# Altium PCB PCB1.PcbDoc (part 1 of 2)
Units mm, origin at the board's own origin, x right, y up, seen from the top; angles counter-clockwise.
Board outline 126 x 133 mm, 6 copper layers (Top Layer, GND Layer, Signal Layer 1, Signal Layer 2, VCC Layer, Bottom Layer), stack 0.887 mm thick; 217 components, 126 nets, 563 pads, 129 vias.
Unrouted connection lines stored in the file: 18.
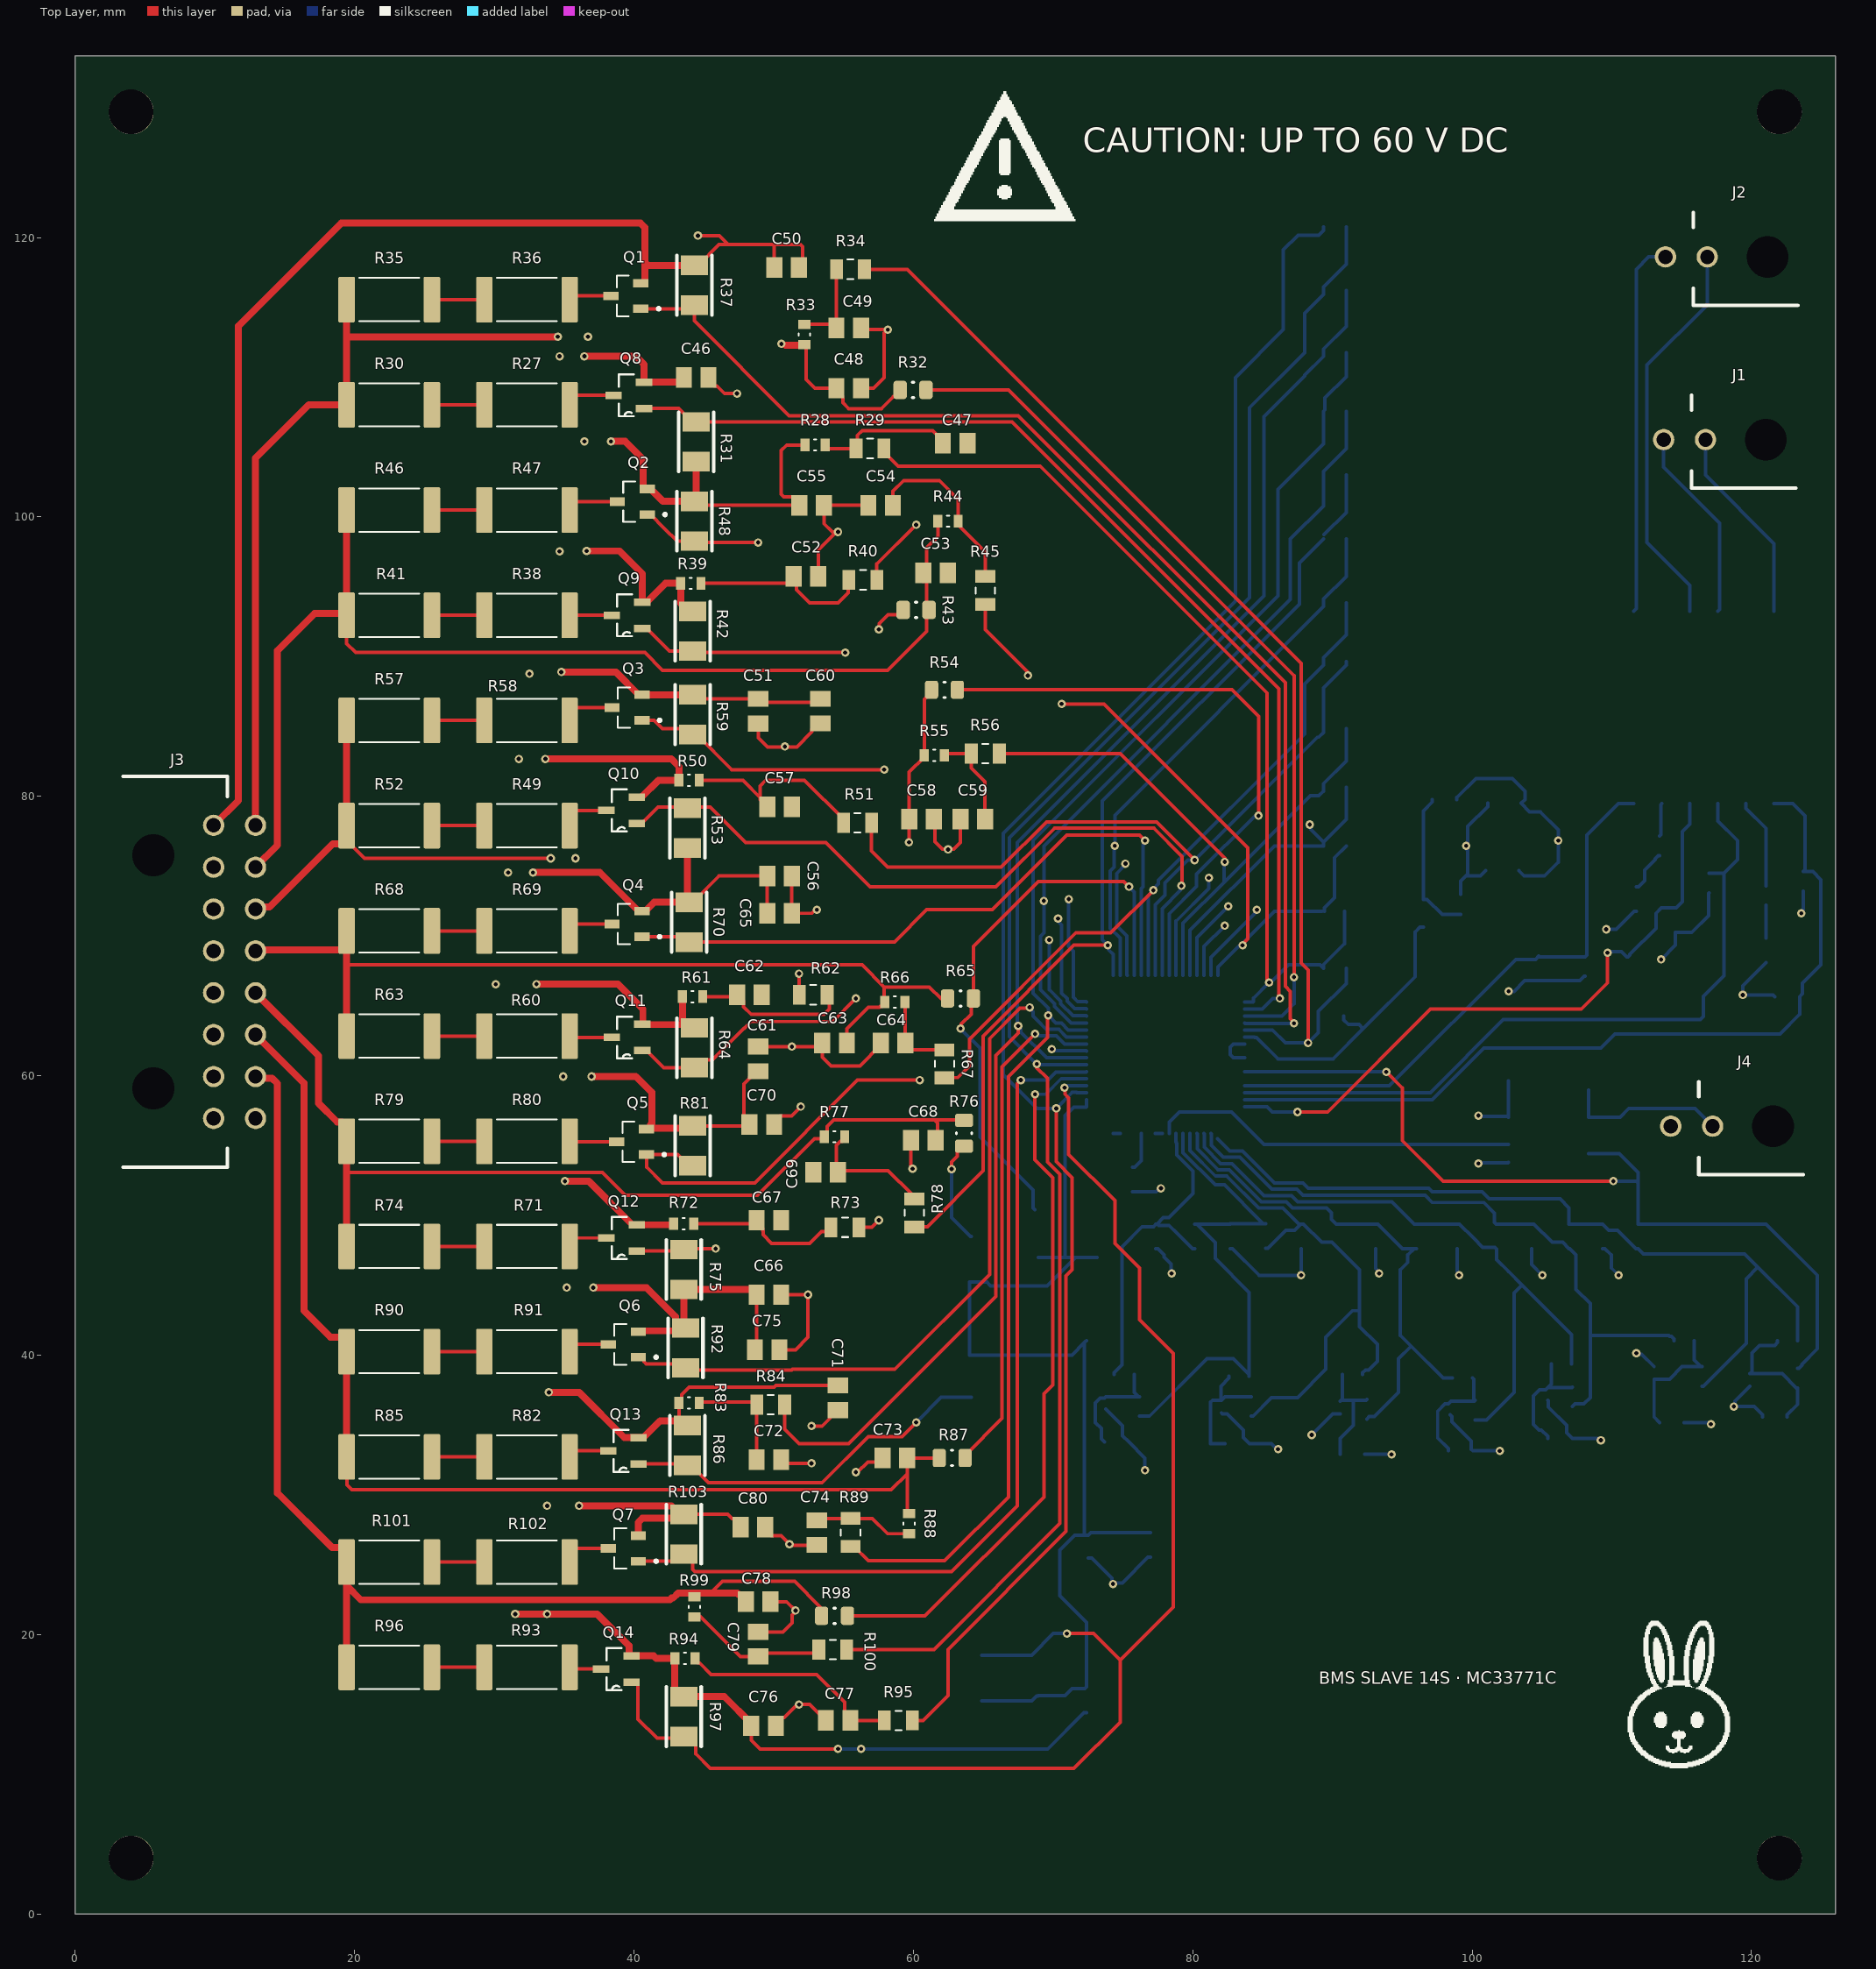
[diagram p0: Top Layer view]
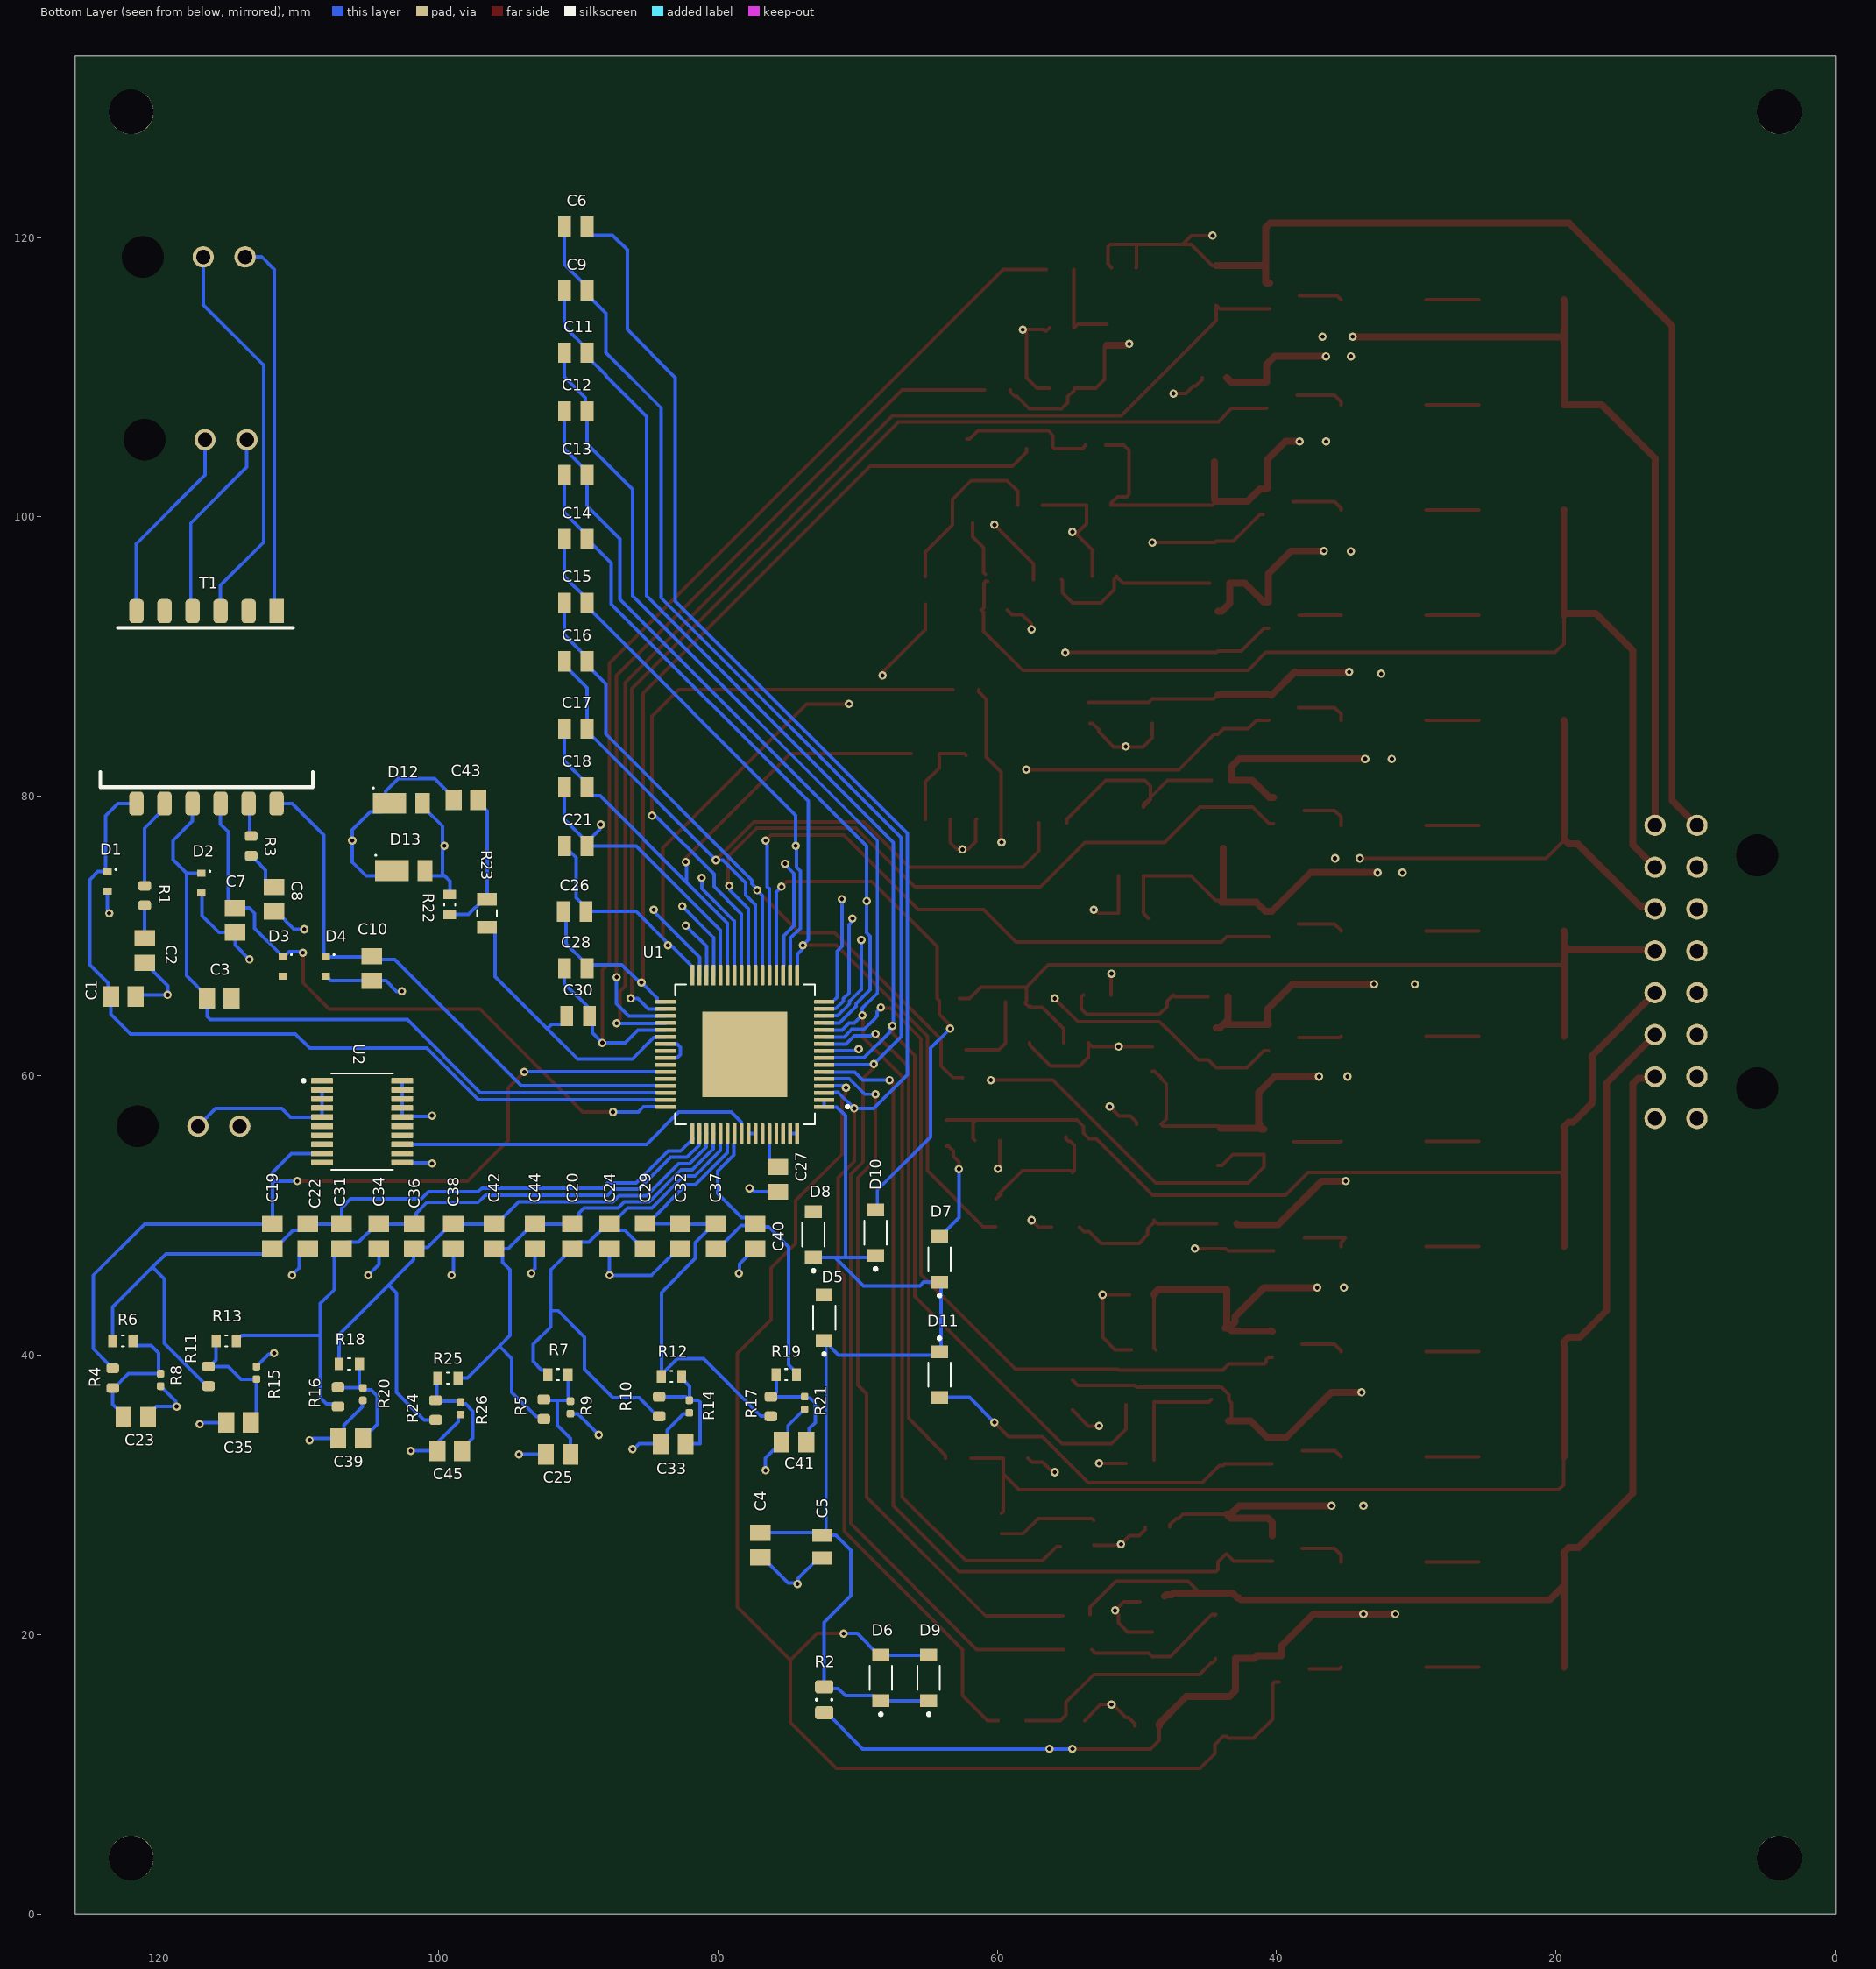
[diagram p1: Bottom Layer view, seen from below]
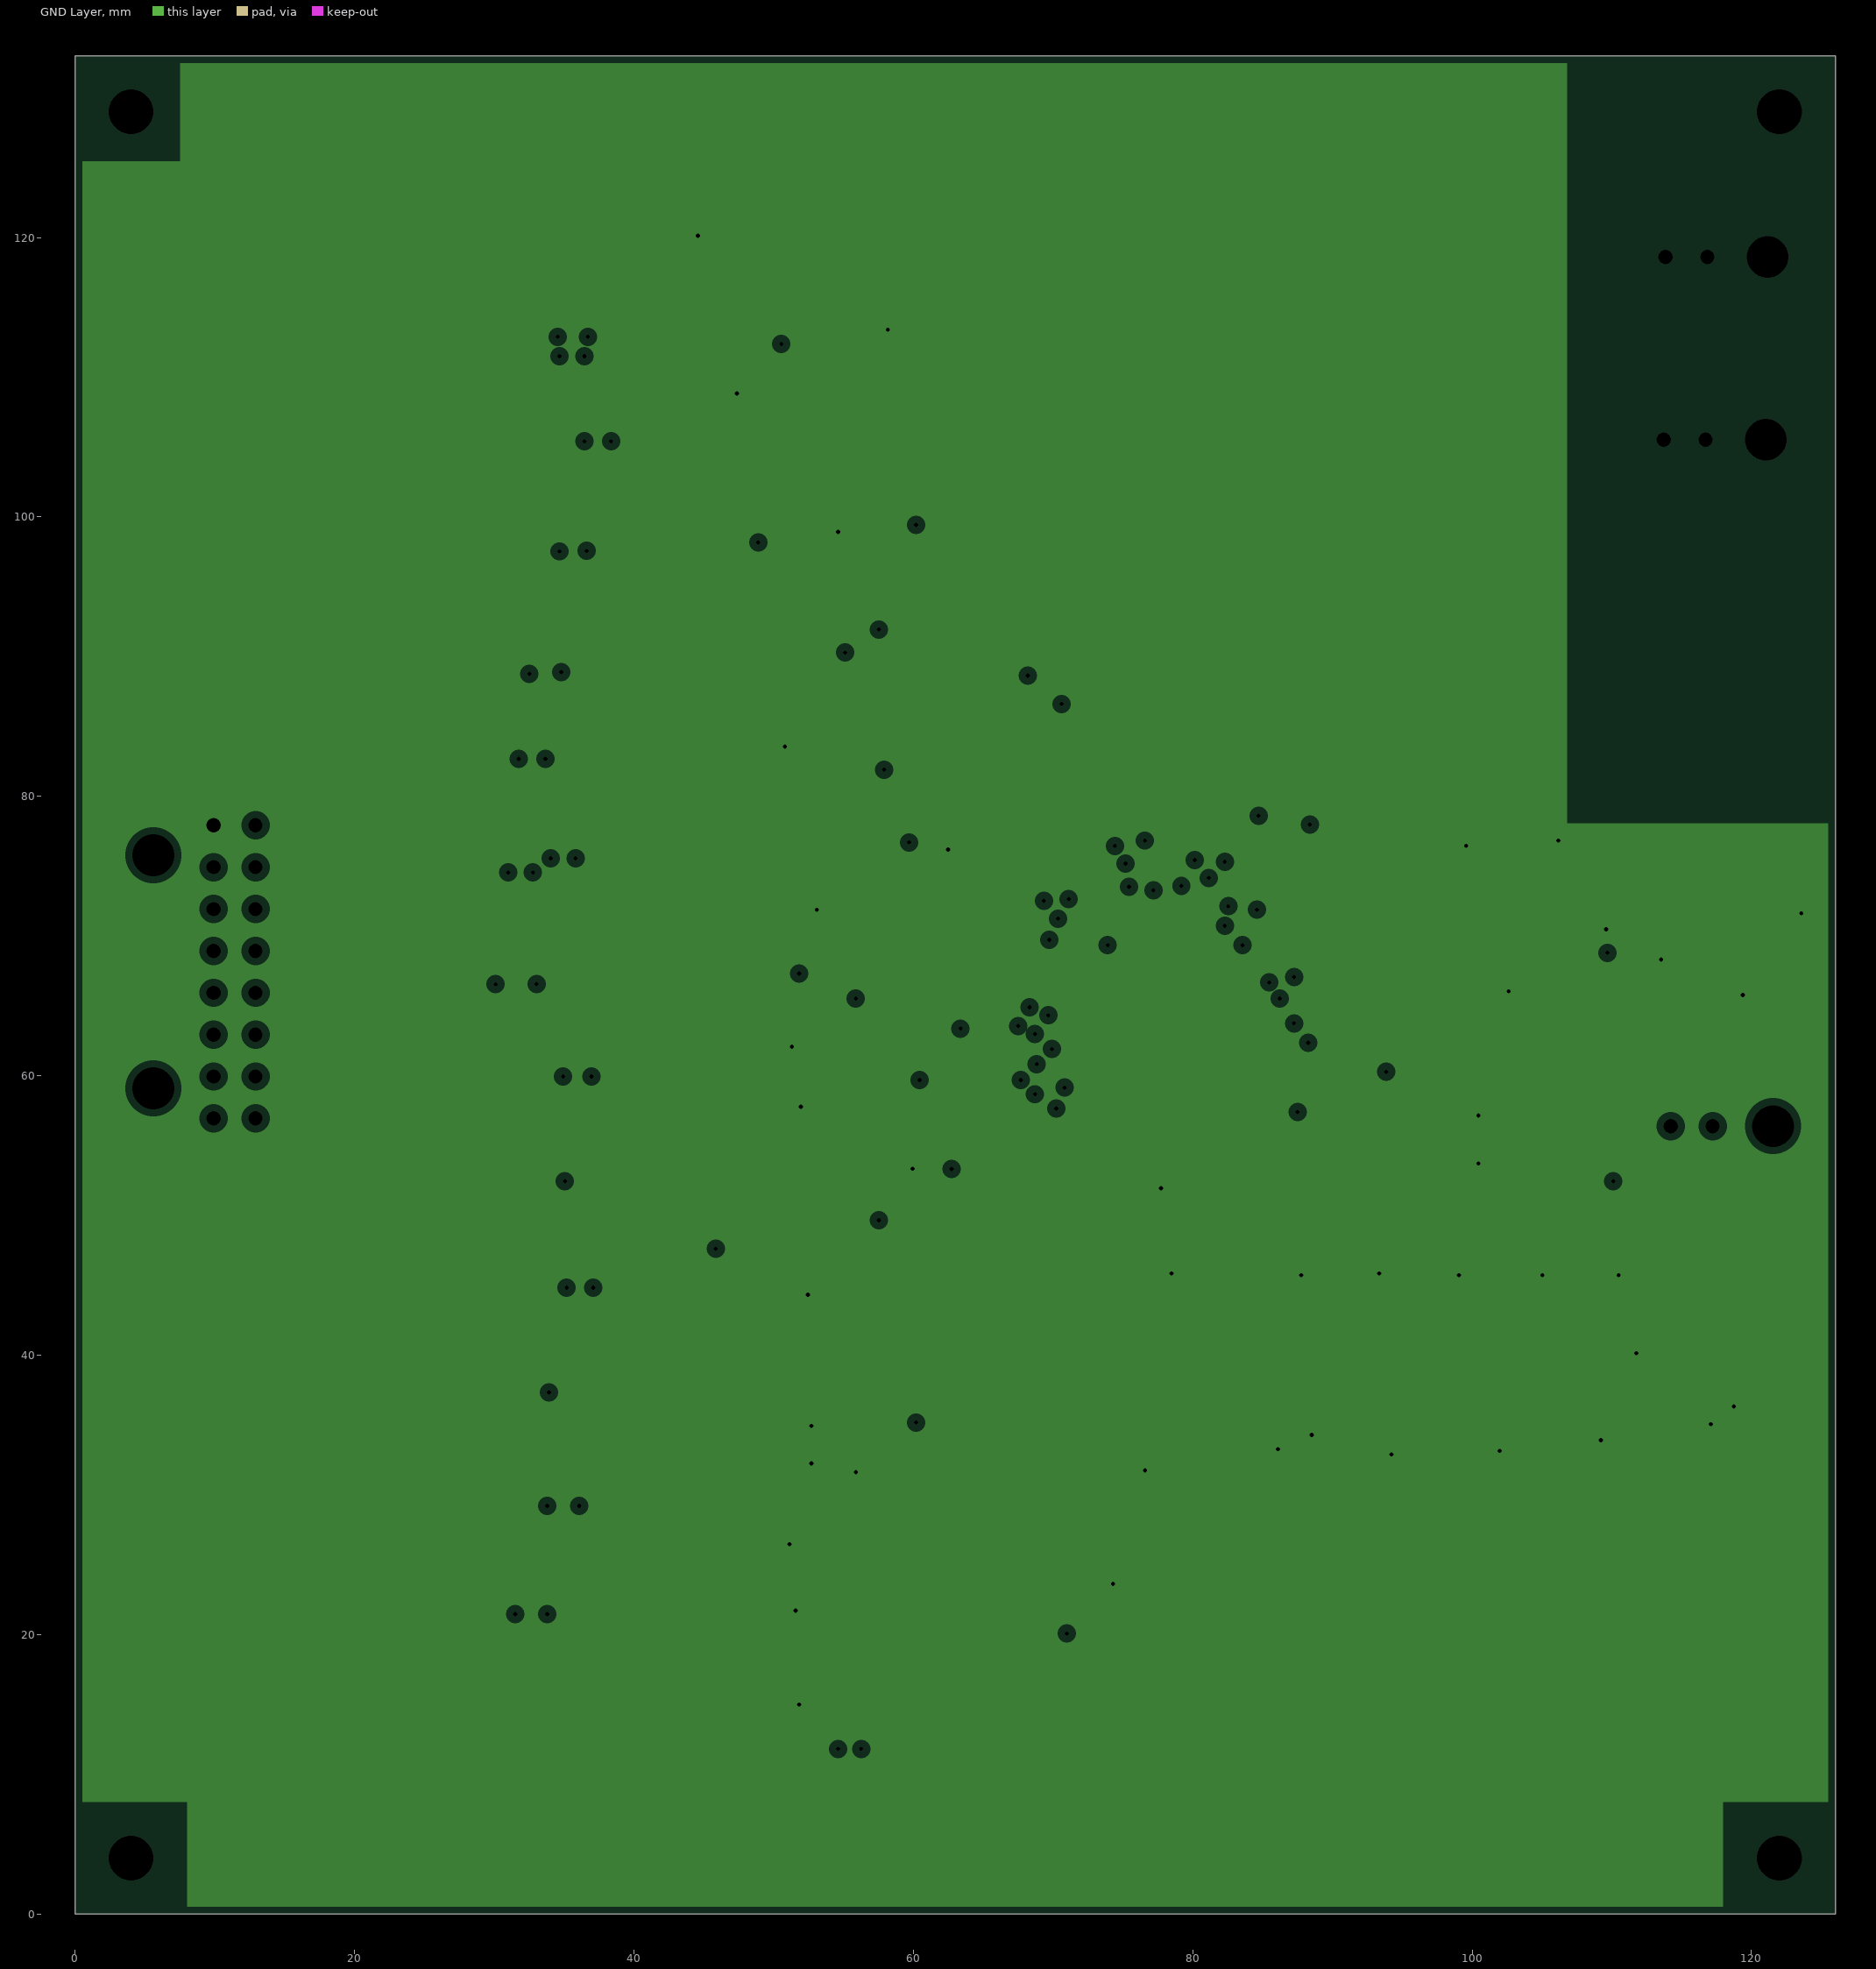
[diagram p2: GND Layer, clearances drawn from the general rule]
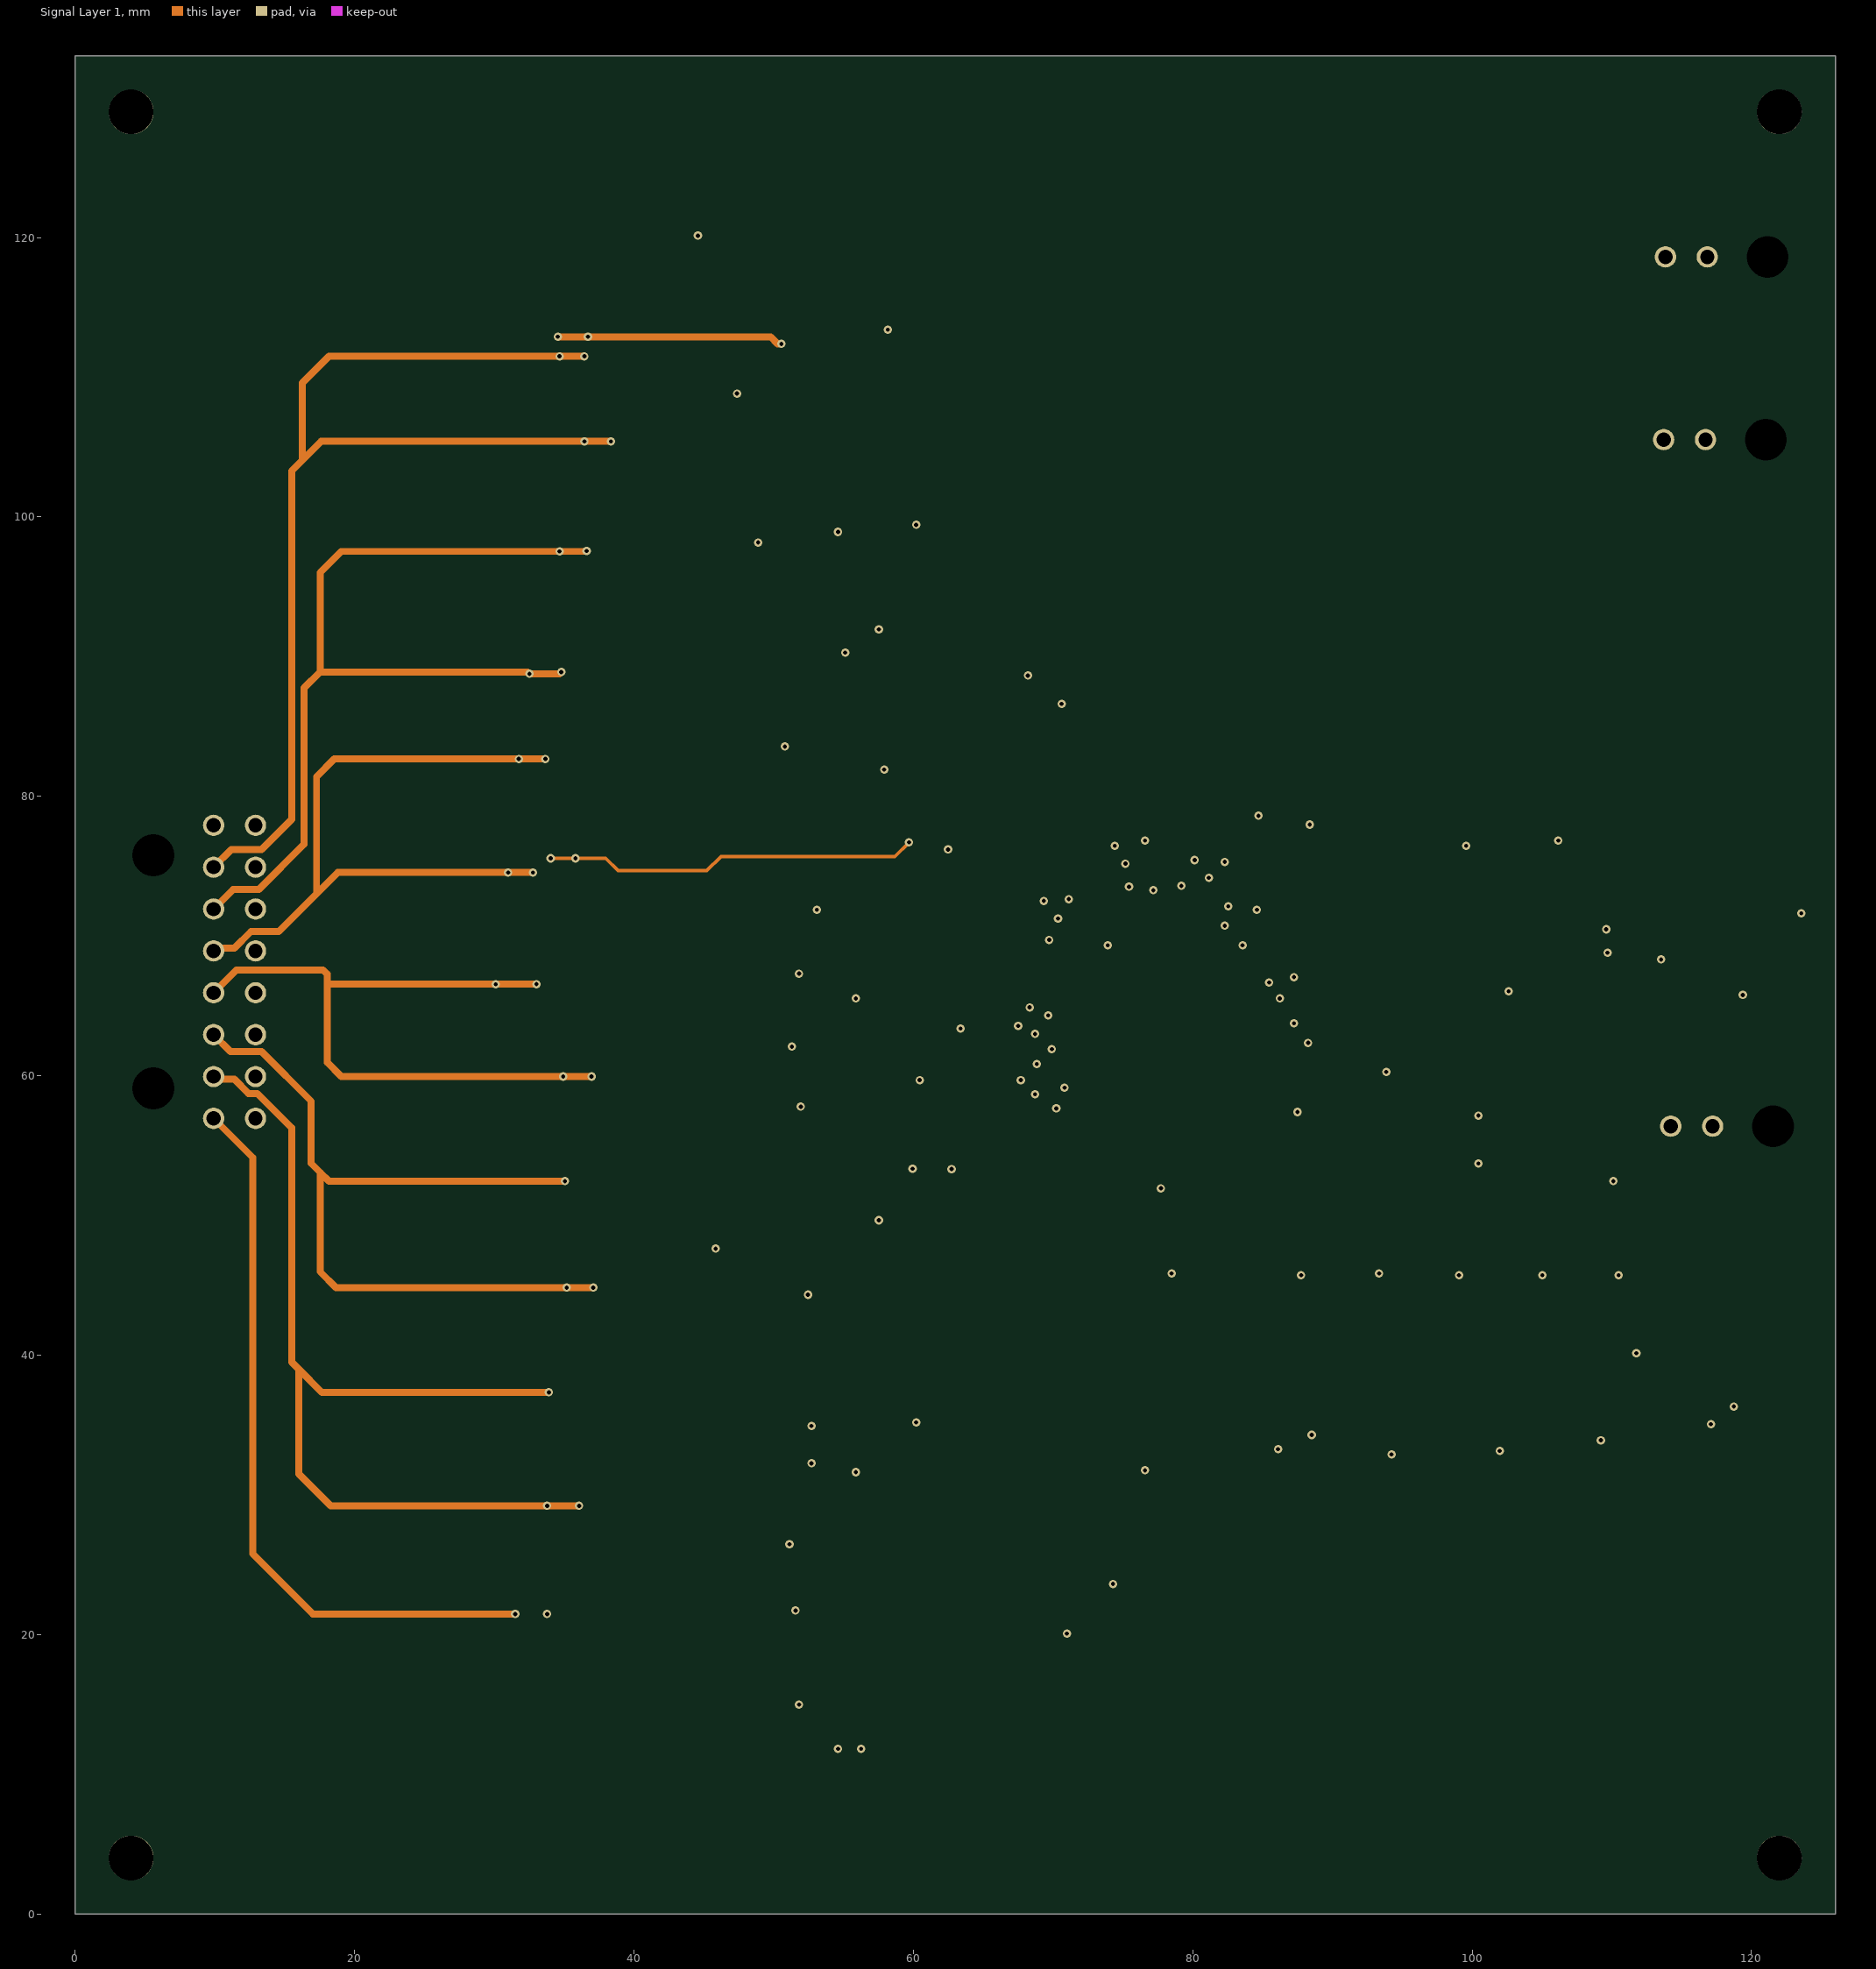
[diagram p3: Signal Layer 1]
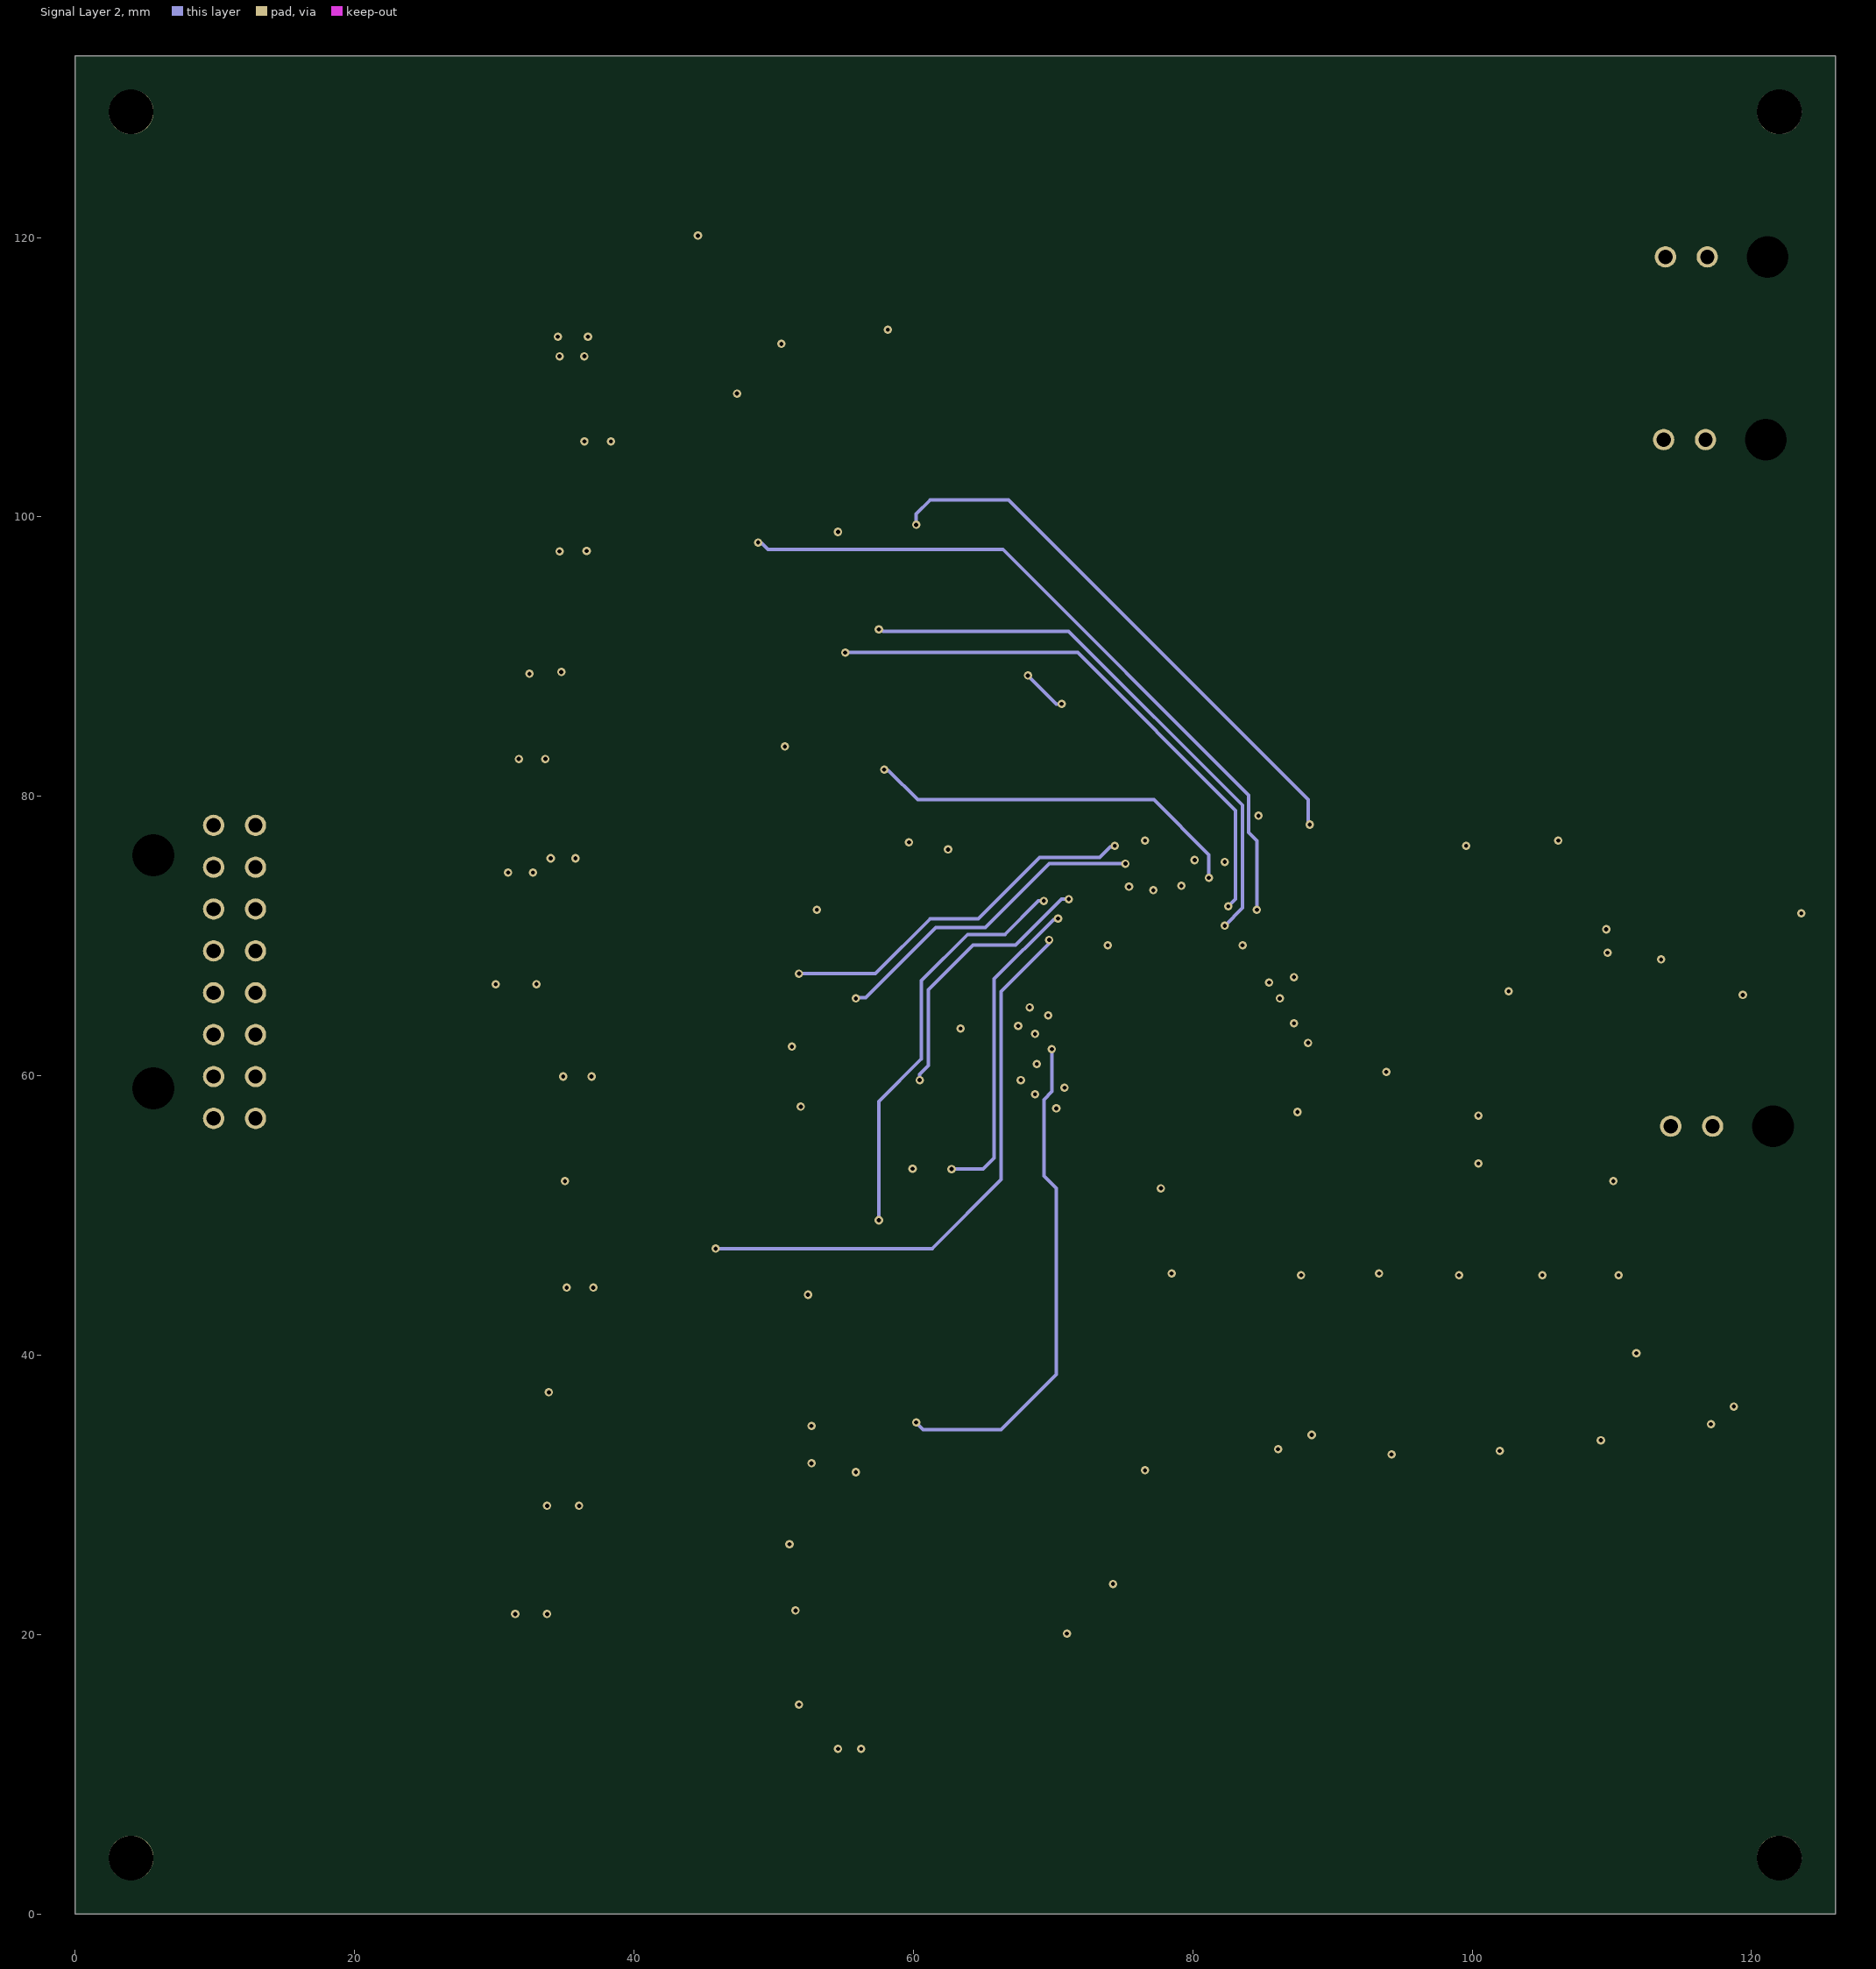
[diagram p4: Signal Layer 2]
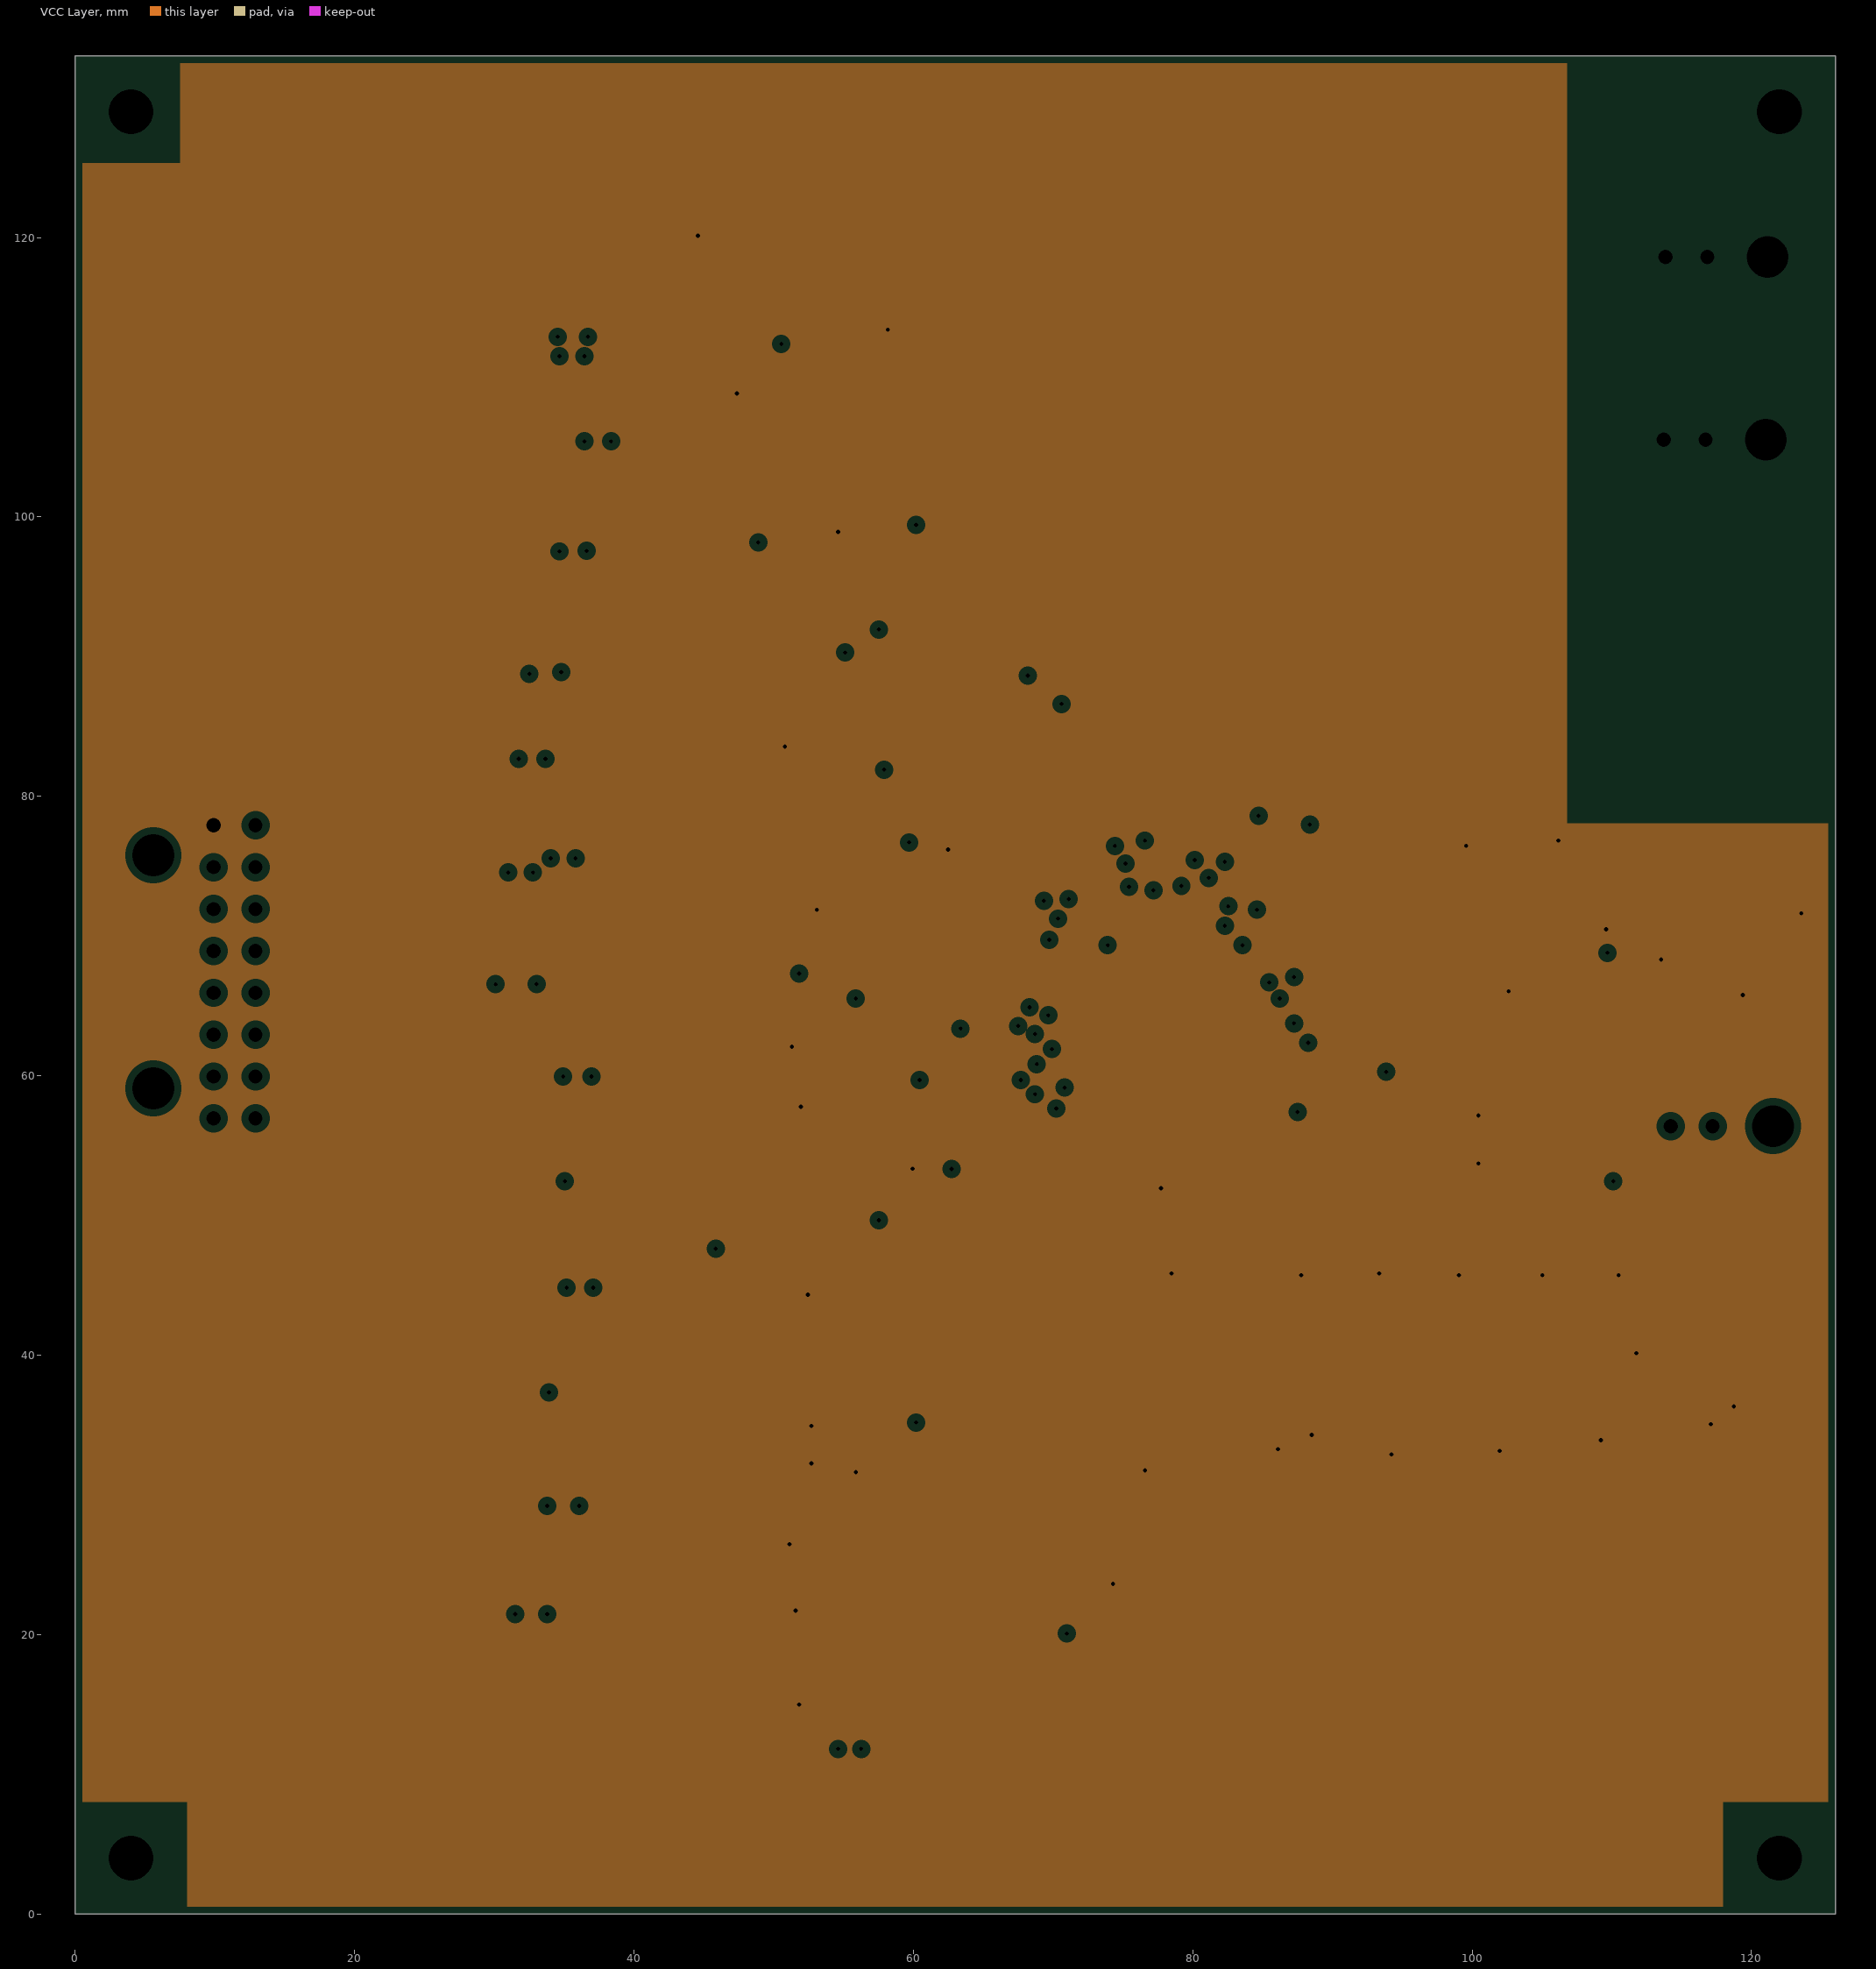
[diagram p5: VCC Layer, clearances drawn from the general rule]

## Layer stack, top to bottom
Top Solder: solder mask 0.0102, Solder Resist, Dk 3.5
Top Layer: signal copper 0.0711
Dielectric 2: prepreg 0.0711, PP-006, Dk 4.1
GND Layer: plane copper 0.035, net BAT_NEG
Dielectric 4: prepreg 0.0711, PP-006, Dk 4.1
Signal Layer 1: signal copper 0.035
Dielectric 1: dielectric 0.32, FR-4, Dk 4.8
Signal Layer 2: signal copper 0.035
Dielectric 5: prepreg 0.0711, PP-006, Dk 4.1
VCC Layer: plane copper 0.035, net BAT_NEG
Dielectric 3: prepreg 0.0711, PP-006, Dk 4.1
Bottom Layer: signal copper 0.0711
Bottom Solder: solder mask 0.0102, Solder Resist, Dk 3.5

## Board outline
0,0 0,133 126,133 126,0

## Design rules (kind name [scope] priority, off if disabled: settings)
Clearance HV_BATNEG [InNet('BAT_NEG') vs Not InComponent('U1')] p1 off: gap=0.6 ignorepadtopadclearanceinfootprint=TRUE
Clearance Clearance1 [All] p2: gap=0.2 ignorepadtopadclearanceinfootprint=TRUE except(0: Arc-Hole Track-Hole SMDPad-Hole THPad-Hole Via-Hole Fill-Hole Poly-Hole Region-Hole Text-Hole)
Clearance [All vs InNet('No Net') And OnLayer('Top Layer')] p3: gap=0.254 ignorepadtopadclearanceinfootprint=TRUE except(0: Arc-Hole Track-Hole SMDPad-Hole THPad-Hole Via-Hole Fill-Hole Poly-Hole Region-Hole Text-Hole)
PlaneClearance [All] p1: clearance=0.508
PlaneConnect [All] p1: planeconnectstyle=Relief reliefexpansion=0.508 reliefentries=4 reliefconductorwidth=0.254 reliefairgap=0.254
PolygonConnect [All] p1: connectstyle=Relief reliefconductorwidth=0.254 reliefentries=4 polygonreliefangle="90 Angle" airgapwidth=0.254
RoutingVias RoutingVias_1 [All] p1: holewidth=0.3 width=0.6 viastyle="Through Hole" minholewidth=0.3 minwidth=0.6 maxholewidth=0.3 maxwidth=0.6
SolderMaskExpansion [All] p1: expansion=0.102 istentingtop=FALSE
Width Width_power [InNetClass('POWER_CELL')] p1: maxlimit=2 minlimit=0.2 preferedwidth=0.5 minimp=50.000000 maximp=50.000000 favimp=50.000000
Width [All] p2: maxlimit=1 minlimit=0.2 preferedwidth=0.25 minimp=50.000000 maximp=50.000000 favimp=50.000000
28 further rules are at their usual default settings.

## Classes and differential pairs
component class U_cell_filter: C46 C47 C48 C49 C50 C51 C52 C53 C54 C55 C56 C57 C58 C59 C60 C61 C62 C63 C64 C65 C66 C67 C68 C69 C70 C71 C72 C73 C74 C75 C76 C77 C78 C79 C80 Q1 Q2 Q3 Q4 Q5 Q6 Q7 Q8 Q9 Q10 Q11 Q12 Q13 Q14 R27 R28 R29 R30 R31 R32 R33 R34 R35 R36 R37 R38 R39 R40 R41 R42 R43 R44 R45 R46 R47 R48 R49 R50 R51 R52 R53 R54 R55 R56 R57 R58 R59 R60 R61 R62 R63 R64 R65 R66 R67 R68 R69 R70 R71 R72 R73 R74 R75 R76 R77 R78 R79 R80 R81 R82 R83 R84 R85 R86 R87 R88 R89 R90 R91 R92 R93 R94 R95 R96 R97 R98 R99 R100 R101 R102 R103
component class MC33771C: C1 C2 C3 C4 C5 C6 C7 C8 C9 C10 C11 C12 C13 C14 C15 C16 C17 C18 C19 C20 C21 C22 C23 C24 C25 C26 C27 C28 C29 C30 C31 C32 C33 C34 C35 C36 C37 C38 C39 C40 C41 C42 C43 C44 C45 D1 D2 D3 D4 D5 D6 D7 D8 D9 D10 D11 D12 D13 J1 J2 J3 J4 R1 R2 R3 R4 R5 R6 R7 R8 R9 R10 R11 R12 R13 R14 R15 R16 R17 R18 R19 R20 R21 R22 R23 R24 R25 R26 T1 TPL_H_N1 TPL_H_P1 TPL_L_N1 TPL_L_P1 U1 U2

## Components (designator, comment, footprint, x,y, rotation, side; value= is the part's Value field where it differs from the comment)
C1 "220p/50V" "CAPC2012X135N - duplicate1" 122.564,65.659 r0 bottom
C2 "10n/100V" "CAPC2012X135N - duplicate1" 121.031,68.97 r90 bottom
C3 "220p/50V" "CAPC2012X135N - duplicate1" 115.688,65.532 r180 bottom
C4 "220nF" CAPC2012X135N 76.962,26.407 r270 bottom
C5 "10000 pF" CAPC2013X110N 72.517,26.289 r270 bottom
C6 "10000 pF Â±10% 50V" CAPC2013X110N 90.17,120.777 r180 bottom
C7 "220p/50V" "CAPC2012X135N - duplicate1" 114.554,71.129 r90 bottom
C8 "10n/100V" "CAPC2012X135N - duplicate1" 111.76,72.635 r90 bottom
C9 "CC0805KRX7R9BB103" CAPC2013X110N 90.17,116.205 r180 bottom
C10 "220p/50V" "CAPC2012X135N - duplicate1" 104.775,67.682 r270 bottom
C11 "CC0805KRX7R9BB103" CAPC2013X110N 90.17,111.76 r180 bottom
C12 "CC0805KRX7R9BB103" CAPC2013X110N 90.17,107.569 r180 bottom
C13 "CC0805KRX7R9BB103" CAPC2013X110N 90.17,102.997 r180 bottom
C14 "CC0805KRX7R9BB103" CAPC2013X110N 90.17,98.425 r180 bottom
C15 "CC0805KRX7R9BB103" CAPC2013X110N 90.17,93.853 r180 bottom
C16 "CC0805KRX7R9BB103" CAPC2013X110N 90.17,89.662 r180 bottom
C17 "CC0805KRX7R9BB103" CAPC2013X110N 90.17,84.836 r180 bottom
C18 "CC0805KRX7R9BB103" CAPC2013X110N 90.17,80.645 r180 bottom
C19 "2n2/100V" "CAPC2012X135N - duplicate1" 111.887,48.505 r90 bottom
C20 "2n2/100V" "CAPC2012X135N - duplicate1" 90.424,48.505 r90 bottom
C21 "CC0805KRX7R9BB103" CAPC2013X110N 90.17,76.454 r180 bottom
C22 "2n2/100V" "CAPC2012X135N - duplicate1" 109.347,48.505 r90 bottom
C23 "2n2/100V" "CAPC2012X135N - duplicate1" 121.666,35.56 r0 bottom
C24 "2n2/100V" "CAPC2012X135N - duplicate1" 87.757,48.505 r90 bottom
C25 "2n2/100V" "CAPC2012X135N - duplicate1" 91.431,32.893 r180 bottom
C26 "CC0805KRX7R9BB103" CAPC2013X110N 90.246,71.755 r180 bottom
C27 "47000pF" CAPC2012X135N 75.692,52.578 r270 bottom
C28 "CC0805KRX7R9BB103" CAPC2013X110N 90.17,67.691 r180 bottom
C29 "2n2/100V" "CAPC2012X135N - duplicate1" 85.217,48.523 r270 bottom
C30 "CC0805KRX7R9BB103" CAPC2013X110N 89.992,64.262 r180 bottom
C31 "2n2/100V" "CAPC2012X135N - duplicate1" 106.934,48.505 r90 bottom
C32 "2n2/100V" "CAPC2012X135N - duplicate1" 82.677,48.505 r90 bottom
C33 "2n2/100V" "CAPC2012X135N - duplicate1" 83.185,33.655 r180 bottom
C34 "2n2/100V" "CAPC2012X135N - duplicate1" 104.267,48.505 r90 bottom
C35 "2n2/100V" "CAPC2012X135N - duplicate1" 114.309,35.179 r180 bottom
C36 "2n2/100V" "CAPC2012X135N - duplicate1" 101.727,48.505 r90 bottom
C37 "2n2/100V" "CAPC2012X135N - duplicate1" 80.137,48.505 r90 bottom
C38 "2n2/100V" "CAPC2012X135N - duplicate1" 98.933,48.505 r90 bottom
C39 "2n2/100V" "CAPC2012X135N - duplicate1" 106.29,34.036 r180 bottom
C40 "2n2/100V" "CAPC2012X135N - duplicate1" 77.343,48.505 r90 bottom
C41 "2n2/100V" "CAPC2012X135N - duplicate1" 74.549,33.782 r180 bottom
C42 "2n2/100V" "CAPC2012X135N - duplicate1" 96.012,48.505 r90 bottom
C43 "X7R, 50V, 0805 0.1 µF" CAPC2012X135N 98.035,79.756 r180 bottom
C44 "2n2/100V" "CAPC2012X135N - duplicate1" 93.091,48.505 r90 bottom
C45 "2n2/100V" "CAPC2012X135N - duplicate1" 99.187,33.147 r180 bottom
C46 "47nF 100V X7R" CAPC2012X135N 44.45,109.982 r0 top
C47 "100nF 100V X7R" CAPC2012X135N 62.992,105.283 r180 top
C48 "47nF 100V X7R" CAPC2012X135N 55.372,109.22 r0 top
C49 "100nF 100V X7R" CAPC2012X135N 55.372,113.538 r180 top
C50 "47nF 100V X7R" CAPC2012X135N 50.927,117.856 r180 top
C51 "47nF 100V X7R" CAPC2012X135N 48.895,86.097 r270 top
C52 "100nF 100V X7R" CAPC2012X135N 52.315,95.758 r180 top
C53 "47nF 100V X7R" CAPC2012X135N 61.595,96.012 r0 top
C54 "100nF 100V X7R" CAPC2012X135N 57.658,100.838 r0 top
C55 "47nF 100V X7R" CAPC2012X135N 52.714,100.838 r0 top
C56 "47nF 100V X7R" CAPC2012X135N 50.419,74.295 r0 top
C57 "100nF 100V X7R" CAPC2012X135N 50.419,79.248 r180 top
C58 "47nF 100V X7R" CAPC2012X135N 60.588,78.359 r0 top
C59 "100nF 100V X7R" CAPC2012X135N 64.253,78.359 r0 top
C60 "47nF 100V X7R" CAPC2012X135N 53.34,86.106 r270 top
C61 "47nF 100V X7R" CAPC2012X135N 48.895,61.205 r90 top
C62 "100nF 100V X7R" CAPC2012X135N 48.269,65.786 r180 top
C63 "47nF 100V X7R" CAPC2012X135N 54.356,62.357 r180 top
C64 "100nF 100V X7R" CAPC2012X135N 58.547,62.357 r0 top
C65 "47nF 100V X7R" CAPC2012X135N 50.428,71.628 r0 top
C66 "47nF 100V X7R" CAPC2012X135N 49.657,44.323 r0 top
C67 "100nF 100V X7R" CAPC2012X135N 49.657,49.657 r180 top
C68 "47nF 100V X7R" CAPC2012X135N 60.706,55.372 r180 top
C69 "100nF 100V X7R" CAPC2012X135N 53.721,53.086 r0 top
C70 "47nF 100V X7R" CAPC2012X135N 49.149,56.515 r0 top
C71 "47nF 100V X7R" CAPC2012X135N 54.61,36.948 r270 top
C72 "100nF 100V X7R" CAPC2012X135N 49.657,32.512 r180 top
C73 "47nF 100V X7R" CAPC2012X135N 58.674,32.639 r180 top
C74 "100nF 100V X7R" CAPC2012X135N 53.086,27.296 r90 top
C75 "47nF 100V X7R" CAPC2012X135N 49.53,40.386 r0 top
C76 "47nF 100V X7R" CAPC2012X135N 49.276,13.462 r0 top
C77 "100nF 100V X7R" CAPC2012X135N 54.61,13.843 r0 top
C78 "47nF 100V X7R" CAPC2012X135N 48.895,22.352 r0 top
C79 "100nF 100V X7R" CAPC2012X135N 48.895,19.304 r270 top
C80 "47nF 100V X7R" CAPC2012X135N 48.514,27.686 r0 top
D1 "PESD5V0V1BB" SOD523_PESD_NEXPERIA 123.698,73.914 r270 bottom
D2 "PESD5V0V1BB" SOD523_PESD_NEXPERIA 116.967,73.787 r270 bottom
D3 "PESD5V0V1BB" SOD523_PESD_NEXPERIA 111.125,67.818 r270 bottom
D4 "PESD5V0V1BB" SOD523_PESD_NEXPERIA 108.077,67.818 r270 bottom
D5 "Zener 43V" DIO_MMSZ5260BT1G 72.39,42.672 r90 bottom
D6 "Zener 8.2 V" DIO_MMSZ5237BT1G 68.326,16.891 r90 bottom
D7 "Zener 28V" DIO_MMSZ5255BT1G 64.135,46.863 r90 bottom
D8 "Zener 28V" DIO_MMSZ5255BT1G 73.152,48.641 r90 bottom
D9 "Zener 8.2 V" DIO_MMSZ5237BT1G 64.897,16.891 r90 bottom
D10 "Zener 43V" DIO_MMSZ5260BT1G 68.707,48.768 r90 bottom
D11 "Zener 20 V" DIO_MMSZ5250BT1G 64.135,38.608 r270 bottom
D12 "DFLS1100Q-7" PowerDI123 102.655,79.502 r180 bottom
D13 "DFLS1100Q-7" PowerDI123 102.489,74.676 r180 bottom
J1 "molex_microfit_3_01x2_THT" MOLEX_MICROFIT_01x2_THT 121.031,105.537 r270 top
J2 "molex_microfit_3_01x2_THT" MOLEX_MICROFIT_01x2_THT 121.158,118.618 r270 top
J3 "molex_microfit_3_08x2_THT" MOLEX_MICROFIT_08x2_THT 5.588,67.437 r90 top
J4 "molex_microfit_3_01x2_THT" MOLEX_MICROFIT_01x2_THT 121.539,56.388 r270 top
Q1 "DMN2041L-7 N 20V 6.4A" SOT91P240X110-3N 39.424,115.824 r180 top
Q2 "DMN2041L-7 N 20V 6.4A" SOT91P240X110-3N 39.878,101.092 r180 top
Q3 "DMN2041L-7 N 20V 6.4A" SOT91P240X110-3N 39.497,86.36 r180 top
Q4 "DMN2041L-7 N 20V 6.4A" SOT91P240X110-3N 39.497,70.866 r180 top
Q5 "DMN2041L-7 N 20V 6.4A" SOT91P240X110-3N 39.824,55.271 r180 top
Q6 "DMN2041L-7 N 20V 6.4A" SOT91P240X110-3N 39.243,40.767 r180 top
Q7 "DMN2041L-7 N 20V 6.4A" SOT91P240X110-3N 39.243,26.162 r180 top
Q8 "PMV48XPAR" SOT95P230X110-3N 39.624,108.712 r180 top
Q9 "PMV48XPAR" SOT95P230X110-3N 39.497,92.964 r180 top
Q10 "PMV48XPAR" SOT95P230X110-3N 39.116,78.994 r180 top
Q11 "PMV48XPAR" SOT95P230X110-3N 39.497,62.738 r180 top
Q12 "PMV48XPAR" SOT95P230X110-3N 39.116,48.387 r180 top
Q13 "PMV48XPAR" SOT95P230X110-3N 39.243,33.147 r180 top
Q14 "PMV48XPAR" SOT95P230X110-3N 38.735,17.526 r180 top
R1 "150R" RESC1608X05N 121.031,72.898 r90 bottom
R2 "10R" RESC2012X05N 72.39,15.331 r90 bottom
R3 "150R" RESC1608X05N 113.411,76.454 r90 bottom
R4 "5k1" RESC1608X05N 123.317,38.354 r90 bottom
R5 "5k1" RESC1608X05N 92.456,36.13 r270 bottom
R6 "3k" RES_ERJPA3D3001V 122.592,41.021 r180 bottom
R7 "3k" RES_ERJPA3D3001V 91.44,38.608 r180 bottom
R8 "10k NTC" RESC1005X04N 119.888,38.227 r90 bottom
R9 "10k NTC" RESC1005X04N 90.551,36.253 r90 bottom
R10 "5k1" RESC1608X05N 84.201,36.322 r270 bottom
R11 "5k1" RESC1608X05N 116.459,38.481 r270 bottom
R12 "3k" RES_ERJPA3D3001V 83.312,38.481 r180 bottom
R13 "3k" RES_ERJPA3D3001V 115.189,41.021 r0 bottom
R14 "10k NTC" RESC1005X04N 82.042,36.322 r90 bottom
R15 "10k NTC" RESC1005X04N 113.03,38.735 r270 bottom
R16 "5k1" RESC1608X05N 107.188,37.019 r270 bottom
R17 "5k1" RESC1608X05N 76.2,36.322 r270 bottom
R18 "3k" RES_ERJPA3D3001V 106.389,39.37 r180 bottom
R19 "3k" RES_ERJPA3D3001V 75.094,38.608 r0 bottom
R20 "10k NTC" RESC1005X04N 105.41,37.211 r90 bottom
R21 "10k NTC" RESC1005X04N 73.787,36.576 r90 bottom
R22 "3K OHM 0.5% 1/4W 0603" RES_ERJPA3D3001V 99.187,72.263 r270 bottom
R23 "2K OHM, 0.125 W,Tol 1%,SMT,0805" RESC2012X50N 96.52,71.628 r270 bottom
R24 "5k1" RESC1608X05N 100.203,36.068 r270 bottom
R25 "3k" RES_ERJPA3D3001V 99.314,38.354 r0 bottom
R26 "10k NTC" RESC1005X04N 98.425,36.195 r90 bottom
R27 "5R1 2W 2512" RESC6331X65N 32.337,108.027 r0 top
R28 "3K OHM 1/4W0603" RES_ERJPA3D3001V 52.959,105.156 r0 top
R29 "2K OHM, 0.125 W,0805" RESC2012X50N 56.896,104.902 r0 top
R30 "5R1 2W 2512" RESC6331X65N 22.479,108.027 r180 top
R31 "68R" RES1206 44.45,105.382 r90 top
R32 "10R" RESC2012X05N 59.98,109.093 r0 top
R33 "3K OHM 0.5% 1/4W 0603" RES_ERJPA3D3001V 52.197,113.067 r90 top
R34 "2K Ohms 0.125 W," RESC2012X50N 55.499,117.729 r0 top
R35 "5R1 2W 2512" RESC6331X65N 22.479,115.558 r0 top
R36 "5R1 2W 2512" RESC6331X65N 32.337,115.558 r0 top
R37 "68R" RES1206 44.323,116.586 r270 top
R38 "5R1 2W 2512" RESC6331X65N 32.337,92.965 r0 top
R39 "3K OHM 0.5% 1/4W 0603" RES_ERJPA3D3001V 44.069,95.25 r0 top
R40 "2K OHM, 0.125 W,0805" RESC2012X50N 56.388,95.504 r0 top
R41 "5R1 2W 2512" RESC6331X65N 22.479,92.965 r0 top
R42 "68R" RES1206 44.196,91.821 r270 top
R43 "10R" RESC2012X05N 60.198,93.345 r180 top
R44 "3K OHM 0.5% 1/4W 0603" RES_ERJPA3D3001V 62.484,99.695 r0 top
R45 "2K Ohms 0.125 W," RESC2012X50N 65.151,94.742 r270 top
R46 "5R1 2W 2512" RESC6331X65N 22.479,100.496 r0 top
R47 "5R1 2W 2512" RESC6331X65N 32.337,100.496 r0 top
R48 "68R" RES1206 44.323,99.695 r270 top
R49 "5R1 2W 2512" RESC6331X65N 32.337,77.902 r0 top
R50 "3K OHM 1/4W 0603" RES_ERJPA3D3001V 43.942,81.153 r0 top
R51 "2K OHM, 0.125 W 0805" RESC2012X50N 56.007,78.105 r0 top
R52 "5R1 2W 2512" RESC6331X65N 22.479,77.902 r0 top
R53 "68R" RES1206 43.815,77.724 r90 top
R54 "10R" RESC2012X05N 62.23,87.63 r0 top
R55 "3K OHM 0.5% 1/4W 0603" RES_ERJPA3D3001V 61.505,82.931 r0 top
R56 "2K Ohms 0.125 W," RESC2012X50N 65.151,83.058 r0 top
R57 "5R1 2W 2512" RESC6331X65N 22.479,85.434 r0 top
R58 "5R1 2W 2512" RESC6331X65N 32.337,85.434 r0 top
R59 "68R" RES1206 44.196,85.852 r270 top
R60 "5R1 2W 2512" RESC6331X65N 32.337,62.84 r0 top
R61 "3K OHM 0.5% 1/4W 0603" RES_ERJPA3D3001V 44.196,65.659 r0 top
R62 "2K OHM, 0.125 W 0805" RESC2012X50N 52.832,65.786 r180 top
R63 "5R1 2W 2512" RESC6331X65N 22.479,62.84 r0 top
R64 "68R" RES1206 44.323,62.004 r270 top
R65 "10R" RESC2012X05N 63.373,65.532 r0 top
R66 "3K OHM 0.5% 1/4W 0603" RES_ERJPA3D3001V 58.674,65.278 r0 top
R67 "2K Ohms 0.125 W," RESC2012X50N 62.23,60.849 r270 top
R68 "5R1 2W 2512" RESC6331X65N 22.479,70.371 r0 top
R69 "5R1 2W 2512" RESC6331X65N 32.337,70.371 r0 top
R70 "68R" RES1206 43.942,70.993 r270 top
R71 "5R1 2W 2512" RESC6331X65N 32.337,47.778 r0 top
R72 "3K OHM 0.5% 1/4W 0603" RES_ERJPA3D3001V 43.561,49.403 r0 top
R73 "2K OHM, 0.125 W,0805" RESC2012X50N 55.102,49.149 r0 top
R74 "5R1 2W 2512" RESC6331X65N 22.479,47.778 r0 top
R75 "68R" RES1206 43.561,46.129 r90 top
R76 "10R" RESC2012X05N 63.627,55.88 r270 top
R77 "3K OHM 0.5% 1/4W 0603" RES_ERJPA3D3001V 54.356,55.626 r0 top
R78 "2K Ohms 0.125 W," RESC2012X50N 60.071,50.181 r270 top
R79 "5R1 2W 2512" RESC6331X65N 22.479,55.309 r0 top
R80 "5R1 2W 2512" RESC6331X65N 32.337,55.309 r0 top
R81 "68R" RES1206 44.196,54.991 r270 top
R82 "5R1 2W 2512" RESC6331X65N 32.337,32.715 r0 top
R83 "3K OHM 0.5% 1/4W 0603" RES_ERJPA3D3001V 43.942,36.576 r0 top
R84 "2K OHM, 0.125 W,0805" RESC2012X50N 49.784,36.449 r0 top
R85 "5R1 2W 2512" RESC6331X65N 22.479,32.715 r0 top
R86 "68R" RES1206 43.815,33.528 r270 top
R87 "10R" RESC2012X05N 62.774,32.639 r0 top
R88 "3K OHM 0.5% 1/4W 0603" RES_ERJPA3D3001V 59.69,27.94 r270 top
R89 "2K Ohms 0.125 W," RESC2012X50N 55.499,27.305 r270 top
R90 "5R1 2W 2512" RESC6331X65N 22.479,40.247 r0 top
R91 "5R1 2W 2512" RESC6331X65N 32.337,40.247 r0 top
R92 "68R" RES1206 43.688,40.513 r270 top
R93 "5R1 2W 2512" RESC6331X65N 32.337,17.653 r0 top
R94 "3K OHM 0.5% 1/4W 0603" RES_ERJPA3D3001V 43.651,18.288 r0 top
R95 "2K OHM, 0.125 W,0805" RESC2012X50N 58.928,13.843 r0 top
R96 "5R1 2W 2512" RESC6331X65N 22.479,17.653 r0 top
R97 "68R" RES1206 43.561,14.125 r270 top
R98 "10R" RESC2012X05N 54.356,21.336 r0 top
R99 "3K OHM 0.5% 1/4W 0603" RES_ERJPA3D3001V 44.323,21.971 r270 top
R100 "2K Ohms 0.125 W," RESC2012X50N 54.229,18.923 r0 top
R101 "5R1 2W 2512" RESC6331X65N 22.479,25.184 r0 top
R102 "5R1 2W 2512" RESC6331X65N 32.337,25.184 r0 top
R103 "68R" RES1206 43.561,27.178 r270 top
T1 "HM2102NLT" HM2102NL 116.586,86.36 r270 bottom
U1 "MC33771C" QFP50P1200X1200X160-65N 78.06,61.528 r0 bottom
U2 "INA253A2IPW" SOP65P640X120-20N 105.461,56.713 r180 bottom

## Footprints (in the part's own frame and the unit in brackets; to place one, negate y for a bottom-side part, rotate by r counter-clockwise, add the part's x,y. Pads: shape width x height; smd on the part's side, far side on the other; paste and mask are expansions set on the pad)
CAPC2012X135N [mm]
  rect 1.15x1.47 smd: 1(-0.88,0) 2(0.88,0)
  body extent -1,-0.63 1,0.62, height 1.35
"CAPC2012X135N - duplicate1" [mm]
  rect 1.15x1.47 smd: 1(-0.88,0) 2(0.88,0)
  body extent -1,-0.63 1,0.63, height 1.4
CAPC2013X110N [mil]
  rect 36x57 smd: 1(-32,0) 2(32,0)
  body extent -39,-25 39,25, height 28
DIO_MMSZ5237BT1G [mm]
  rect 0.91x1.22 smd paste+0 mask+0.102: 1(-1.635,0) 2(1.635,0)
  silkscreen extent -2.7,-0.8 0.86,0.8, body extent -1.84,-0.8 1.84,0.8, height 1.35
DIO_MMSZ5250BT1G [mm]
  rect 0.91x1.22 smd paste+0 mask+0.102: 1(-1.635,0) 2(1.635,0)
  silkscreen extent -2.7,-0.8 0.86,0.8, body extent -1.84,-0.8 1.84,0.8, height 1.35
DIO_MMSZ5255BT1G [mm]
  rect 0.91x1.22 smd paste+0 mask+0.102: 1(-1.635,0) 2(1.635,0)
  silkscreen extent -2.7,-0.8 0.86,0.8, body extent -1.84,-0.8 1.84,0.8, height 1.35
DIO_MMSZ5260BT1G [mm]
  rect 0.91x1.22 smd paste+0 mask+0.102: 1(-1.635,0) 2(1.635,0)
  silkscreen extent -2.7,-0.8 0.86,0.8, body extent -1.84,-0.8 1.84,0.8, height 1.35
HM2102NL [mil]
  rect 67.5x40 smd: 1(-271.65,196.85)
  rrect50% 67.5x40 smd: 2(-271.65,117.85) 3(-271.65,38.85) 4(-271.65,-40.15) 5(-271.65,-119.15) 6(-271.65,-198.15) 7(270.85,-198.15) 8(270.85,-119.15) 9(270.85,-40.15) 10(270.85,38.85) 11(270.85,117.85) 12(270.85,196.85)
  silkscreen extent -224,-300 224,299, body extent -224,-299 224,299, height 197
MOLEX_MICROFIT_01x2_THT [mil] "Micro-Fit 3.0 Right Angle Header, 3.00mm Pitch, Dual Row, 2 Circuits, with Snap-in Plastic Peg PCB Lock, Tin, Glow Wire Capable, Black, 43045-0200"
  round 60 hole 40: 1(0,-170) 2(0,-287.99)
  round 39.37 hole 117.99 unplated paste-99999 mask+4: ""(0,0)
  silkscreen extent -125,-209 137,85, body extent -141,-301 141,181, height 345
MOLEX_MICROFIT_08x2_THT [mil] "Micro-Fit 3.0 Right Angle Header, 3.00mm Pitch, Dual Row, 16 Circuits, with Snap-in Plastic Peg PCB Lock, Tin, Glow Wire Capable, Black, 43045-1600"
  round 60 hole 40: 1(-412.99,-170) 2(-295,-170) 3(-177.01,-170) 4(-59.02,-170) 5(59.02,-170) 6(177.01,-170) 7(295,-170) 8(412.99,-170) 9(-412.99,-287.99) 10(-295,-287.99) 11(-177.01,-287.99) 12(-59.02,-287.99) 13(59.02,-287.99) 14(177.01,-287.99) 15(295,-287.99) 16(412.99,-287.99)
  round 39.37 hole 117.99 unplated paste-99999 mask+4: ""(-328.5,0) ""(328.5,0)
  silkscreen extent -551,-209 551,85, body extent -554,-301 554,181, height 345
PowerDI123 [mm] "PowerDI123, 2-Leads, Body 1,78x3,70mm, IPC Medium Density"
  rect 2.4x1.5 smd: 1(-0.85,0)
  rect 1.05x1.5 smd: 2(1.525,0)
  silkscreen extent -2.05,1.05 -1.95,1.15, body extent -1.85,-0.96 1.85,0.96, height 1
QFP50P1200X1200X160-65N [mm]
  rrect25% 1.47x0.28 smd paste+0 mask+0.102: 1(-5.67,3.75) 2(-5.67,3.25) 3(-5.67,2.75) 4(-5.67,2.25) 5(-5.67,1.75) 6(-5.67,1.25) 7(-5.67,0.75) 8(-5.67,0.25) 9(-5.67,-0.25) 10(-5.67,-0.75) 11(-5.67,-1.25) 12(-5.67,-1.75) 13(-5.67,-2.25) 14(-5.67,-2.75) 15(-5.67,-3.25) 16(-5.67,-3.75) 33(5.67,-3.75) 34(5.67,-3.25) 35(5.67,-2.75) 36(5.67,-2.25) 37(5.67,-1.75) 38(5.67,-1.25) 39(5.67,-0.75) 40(5.67,-0.25) 41(5.67,0.25) 42(5.67,0.75) 43(5.67,1.25) 44(5.67,1.75) 45(5.67,2.25) 46(5.67,2.75) 47(5.67,3.25) 48(5.67,3.75)
  rrect25% 0.28x1.47 smd paste+0 mask+0.102: 17(-3.75,-5.67) 18(-3.25,-5.67) 19(-2.75,-5.67) 20(-2.25,-5.67) 21(-1.75,-5.67) 22(-1.25,-5.67) 23(-0.75,-5.67) 24(-0.25,-5.67) 25(0.25,-5.67) 26(0.75,-5.67) 27(1.25,-5.67) 28(1.75,-5.67) 29(2.25,-5.67) 30(2.75,-5.67) 31(3.25,-5.67) 32(3.75,-5.67) 49(3.75,5.67) 50(3.25,5.67) 51(2.75,5.67) 52(2.25,5.67) 53(1.75,5.67) 54(1.25,5.67) 55(0.75,5.67) 56(0.25,5.67) 57(-0.25,5.67) 58(-0.75,5.67) 59(-1.25,5.67) 60(-1.75,5.67) 61(-2.25,5.67) 62(-2.75,5.67) 63(-3.25,5.67) 64(-3.75,5.67)
  rect 6.1x6.1 smd paste-3.81 mask+0.05: 65(0,0)
  silkscreen extent -7.44,-5 5,5, body extent -6,-6 6,6, height 1.6
RES1206 [mm]
  rect 1.4x1.95 smd: 1(-1.425,0) 2(1.425,0)
  silkscreen extent -2.12,-1.25 2.13,1.25, body extent -1.65,-0.87 1.65,0.88, height 0.6
RES_ERJPA3D3001V [mm]
  rect 0.65x0.9 smd paste+0 mask+0.102: 1(-0.725,0) 2(0.725,0)
  silkscreen extent -0.08,-0.4 0.08,0.4, body extent -0.8,-0.4 0.8,0.4, height 0.45
RESC1005X04N [mm] "Chip Resistor, 2-Leads, Body 1,00x0,50mm, IPC Medium Density"
  rrect50% 0.55x0.55 smd: 1(-0.45,0) 2(0.45,0)
  body extent -0.52,-0.28 0.52,0.28, height 0.4
RESC1608X05N [mm] "Chip Resistor, 2-Leads, Body 1,60x0,80mm, IPC Medium Density"
  rrect50% 0.7x0.9 smd: 1(-0.7,0) 2(0.7,0)
  body extent -0.85,-0.45 0.85,0.45, height 0.45
RESC2012X05N [mm] "Chip Resistor, 2-Leads, Body 2,00x1,20mm, IPC Medium Density"
  rrect40% 0.95x1.3 smd: 1(-0.925,0) 2(0.925,0)
  silkscreen extent -0.05,-0.55 0.05,0.55, body extent -1.05,-0.65 1.05,0.65, height 0.5
RESC2012X50N [mm]
  rect 0.92x1.42 smd paste+0 mask+0.102: 1(-1,0) 2(1,0)
  silkscreen extent -0.22,-0.7 0.22,0.7, body extent -1,-0.62 1,0.62, height 0.5
RESC6331X65N [mm]
  rrect15% 1.17x3.27 smd: 1(-3.055,0) 2(3.055,0)
  silkscreen extent -2.15,-1.55 2.15,1.55, body extent -3.17,-1.55 4.32,1.55, height 0.65
SOD523_PESD_NEXPERIA [mm] "SODFL, 2-Leads, Body 0,80x1,60mm, IPC Medium Density"
  rect 0.5x0.6 smd: 1(-0.7,0) 2(0.7,0)
  silkscreen extent -0.9,0.55 -0.8,0.65, body extent -0.8,-0.43 0.8,0.43, height 0.65
SOP65P640X120-20N [mm]
  rrect25% 1.57x0.41 smd: 1(-2.87,2.925) 2(-2.87,2.275) 3(-2.87,1.625) 4(-2.87,0.975) 5(-2.87,0.325) 6(-2.87,-0.325) 7(-2.87,-0.975) 8(-2.87,-1.625) 9(-2.87,-2.275) 10(-2.87,-2.925) 11(2.87,-2.925) 12(2.87,-2.275) 13(2.87,-1.625) 14(2.87,-0.975) 15(2.87,-0.325) 16(2.87,0.325) 17(2.87,0.975) 18(2.87,1.625) 19(2.87,2.275) 20(2.87,2.925)
  silkscreen extent -4.29,-3.45 2.2,3.45
SOT91P240X110-3N [mm]
  rect 1.09x0.61 smd: 1(-1.07,0.915) 2(-1.07,-0.915) 3(1.07,0)
  silkscreen extent -2.44,-1.45 0.65,1.45, body extent -1.2,-1.45 1.2,1.45, height 1.14
SOT95P230X110-3N [mil]
  rect 46x21 smd paste+0 mask+4.02: 1(-43,37) 2(-43,-37) 3(43,0)
  silkscreen extent -14,-59 28,59, body extent -45,-57 45,57, height 43

## Part data
C1 C3 C7 C10: library part gen_C_ceramic_220p_50V_C0G_0603, "MLCC", Capacitance=220p, Case EIA=0603, Case Metric=1608, Dielectric=C0G, PnP Package=0603C, Rated Voltage=50V, Supplier Part Number 1=603-AC603JRNPO9BN221, AEC-Q Norm=AEC-Q200, Automotive Qualified=True, ECCN=EAR99, Part Number=gen_C_ceramic_220p_50V_C0G_0603, Supplier 1=Mouser
C2 C8: library part gen_C_ceramic_10n_100V_X7R_0603, "MLCC", Capacitance=10n, Case EIA=0603, Case Metric=1608, Dielectric=X7R, PnP Package=0603C, PnP Value=10nF/100V/X7R, Rated Voltage=100V, Supplier Part Number 1=1301715, AEC-Q Norm=AEC-Q200, Automotive Qualified=True, ECCN=EAR99, Part Number=gen_C_ceramic_10n_100V_X7R_0603, Supplier 1=Farnell, Supplier 2=Farnell, Supplier 3=Farnell, Supplier Part Number 2=2821192, Supplier Part Number 3=2210878
C4: library part GRM21BR71E225KA73L, "SMD Capacitor X7R(EIA) with Capacitance: 2.2uF Tol. 10%. Rated Voltage: 25Vdc", Package="2012 Murata", Check_prices=https://www.snapeda.com/parts/GRM21BR71E225KA73L/Murata/view-part/?ref=eda, MF=Murata, MP=GRM21BR71E225KA73L, SnapEDA_Link=https://www.snapeda.com/parts/GRM21BR71E225KA73L/Murata/view-part/?ref=snap
C5 C6: library part CC0805KRX7R9BB103, "10000 pF Â±10% 50V Ceramic Capacitor X7R 0805 (2012 Metric)", Package="0805 Yageo", Check_prices=https://www.snapeda.com/parts/CC0805KRX7R9BB103/Yageo/view-part/?ref=eda, MF=Yageo, MP=CC0805KRX7R9BB103, SnapEDA_Link=https://www.snapeda.com/parts/CC0805KRX7R9BB103/Yageo/view-part/?ref=snap
C9 C11 C12 C13 C14 C15 C16 C17 C18 C21 C26 C28 C30: "10000 pF Â±10% 50V Ceramic Capacitor X7R 0805 (2012 Metric)", Package="0805 Yageo", Check_prices=https://www.snapeda.com/parts/CC0805KRX7R9BB103/Yageo/view-part/?ref=eda, MF=Yageo, MP=CC0805KRX7R9BB103, SnapEDA_Link=https://www.snapeda.com/parts/CC0805KRX7R9BB103/Yageo/view-part/?ref=snap
C19 C20 C22 C23 C24 C25 C29 C31 C32 C33 C34 C35 C36 C37 C38 C39 C40 C41 C42 C44 C45: "MLCC", Capacitance=2n2, Case EIA=0402, Case Metric=1005, Dielectric=X7R, Part Number=gen_C_ceramic_2n2_100V_X7R_0402, PnP Package=0402C, Rated Voltage=100V, Supplier Part Number 1=490-4911-1-ND, Automotive Qualified=True, Supplier 1=Digikey
C27: library part GRM21BR71H473KA01L, "SMD Capacitor X7R(EIA) with Capacitance: 47000pF Tol. 10%. Rated Voltage: 50Vdc", Package="805-2 Murata", Check_prices=https://www.snapeda.com/parts/GRM21BR71H473KA01L/Murata/view-part/?ref=eda, MF=Murata, MP=GRM21BR71H473KA01L, SnapEDA_Link=https://www.snapeda.com/parts/GRM21BR71H473KA01L/Murata/view-part/?ref=snap
C43: library part GRM21BR71H104KA01L, "Seramik, X7R, 50V, 0805 Kılıf0.1 µF / 100 nF", Package="805-2 Murata", Check_prices=https://www.snapeda.com/parts/GRM21BR71H104KA01L/Murata/view-part/?ref=eda, MF=Murata, MP=GRM21BR71H104KA01L, SnapEDA_Link=https://www.snapeda.com/parts/GRM21BR71H104KA01L/Murata/view-part/?ref=snap
C46 C48 C50 C51 C53 C55 C56 C58 C60 C61 C63 C65 C66 C68 C70 C71 C73 C75 C76 C78 C80: library part GRM21BR71H473KA01L, "SMD Capacitor X7R(EIA) with Capacitance: 47000pF Tol. 10%. Rated Voltage: 100Vdc", Package=yageo, Check_prices=https://www.snapeda.com/parts/GRM21BR71H473KA01L/Murata/view-part/?ref=eda, MF=Yageo, MP=CC0805KKX7R0BB473
C47 C49 C52 C54 C57 C59 C62 C64 C67 C69 C72 C74 C77 C79: library part GRM21BR71H104KA01L, "Seramik, X7R, 100V, 0805 Kılıf0.1 µF / 100 nF", Package="805-2 Murata", Check_prices=https://www.snapeda.com/parts/GRM21BR71H104KA01L/Murata/view-part/?ref=eda, MF=Yageo, MP=CC0805KKX7R0BB104, SnapEDA_Link=https://www.snapeda.com/parts/GRM21BR71H104KA01L/Murata/view-part/?ref=snap
D1 D2 D3 D4: "Very low capacitance bidirectional ESD protection diode", Breakdown Voltage=6.8V, Manufacturer=Nexperia, Operating Temperature="-55°C - +150°C", PnP Package=SOD523, Supplier Part Number 1=771-PESD5V0V1BB115, AEC-Q Norm=AEC-Q101, Automotive Qualified=True, ComponentLink1Description=Datasheet, ComponentLink1URL=https://assets.nexperia.com/documents/data-sheet/PESD5V0V1BB.pdf, ECCN=EAR99, Part Name=PESD5V0V1BB, Part Number=PESD5V0V1BB, Supplier 1=Mouser, Supplier 2=Digikey, Supplier 3=Farnell, Supplier Part Number 2=1727-5808-1-ND, Supplier Part Number 3=2069367
D5 D10: library part MMSZ5260BT1G, "MMSZ5260BT1G Zener Diode, 43V 5% 0.5 W SMT 2-Pin SOD-123", Package="SOD-123-2 ON Semiconductor", Check_prices=https://www.snapeda.com/parts/MMSZ5260BT1G/Onsemi/view-part/?ref=eda, MF="ON Semiconductor", MP=MMSZ5260BT1G, SnapEDA_Link=https://www.snapeda.com/parts/MMSZ5260BT1G/Onsemi/view-part/?ref=snap
D6 D9: library part MMSZ5237BT1G, "Zener Diode 8.2 V 500 mW Â±5% Surface Mount SOD-123", Package="SOD-123-2 ON Semiconductor", Check_prices=https://www.snapeda.com/parts/MMSZ5237BT1G/Onsemi/view-part/?ref=eda, MF="ON Semiconductor", MP=MMSZ5237BT1G, SnapEDA_Link=https://www.snapeda.com/parts/MMSZ5237BT1G/Onsemi/view-part/?ref=snap
D7 D8: library part MMSZ5255BT1G, "MMSZ5255BT1G Zener Diode, 28V 5% 500 mW SMT 2-Pin SOD-123", Package="SOD-123-2 ON Semiconductor", Check_prices=https://www.snapeda.com/parts/MMSZ5255BT1G/Onsemi/view-part/?ref=eda, MF="ON Semiconductor", MP=MMSZ5255BT1G, SnapEDA_Link=https://www.snapeda.com/parts/MMSZ5255BT1G/Onsemi/view-part/?ref=snap
D11: library part MMSZ5250BT1G, "Zener Diode 20 V 500 mW Â±5% Surface Mount SOD-123", Package="SOD-123-2 ON Semiconductor", Check_prices=https://www.snapeda.com/parts/MMSZ5250BT1G/Onsemi/view-part/?ref=eda, MF="ON Semiconductor", MP=MMSZ5250BT1G, SnapEDA_Link=https://www.snapeda.com/parts/MMSZ5250BT1G/Onsemi/view-part/?ref=snap
D12 D13: "Schottky Diode", Breakdown Voltage=100V, Continuous Forward Current=1A, Manufacturer="Diodes Inc.", Operating Temperature="−55°C - +175°C", PnP Package=POWERDI123, Supplier Part Number 1=621-DFLS1-100Q-7, Automotive Qualified=True, ComponentLink1Description=Datasheet, ComponentLink1URL=https://www.diodes.com/assets/Datasheets/ds30497.pdf, Part Name=DFLS1100Q-7, Part Number=DFLS1100Q-7, Supplier 1=Mouser, Supplier 2=Digikey, Supplier 3=Farnell, Supplier Part Number 2=DFLS1100Q-7DICT-ND, Supplier Part Number 3=3127293
J1 J2 J4: "Micro-Fit 3.0 Right Angle Header, 3.00mm Pitch, Dual Row, 2 Circuits, with Snap-in Plastic Peg PCB Lock, Tin, Glow Wire Capable, Black, 43045-0200", Manufacturer=Molex, Operating Temperature="-40°C - +105°C", Part Name=MicroFit, Rated Current=8.5A, Rated Voltage=600V, Supplier Part Number 1=1012251, Automotive Qualified=False, Circuits=2, ECCN=EAR99, Part Number=molex_microfit_3_01x2_THT, Supplier 1=Farnell
J3: "Micro-Fit 3.0 Right Angle Header, 3.00mm Pitch, Dual Row, 16 Circuits, with Snap-in Plastic Peg PCB Lock, Tin, Glow Wire Capable, Black, 43045-1600", Manufacturer=Molex, Operating Temperature="-40°C - +105°C", Part Name=MicroFit, Rated Current=8.5A, Rated Voltage=600V, Supplier Part Number 1=9961380, Automotive Qualified=False, Circuits=16, ECCN=EAR99, Part Number=molex_microfit_3_08x2_THT, Supplier 1=Farnell
Q1 Q2 Q3 Q4 Q5 Q6 Q7: library part DMN2041L-7, "MOSFET N-Channel 20V 6.4A SOT23", Package="SOT-23 Diodes Inc.", Check_prices=https://www.snapeda.com/parts/DMN2041L-7/Diodes+Inc./view-part/?ref=eda, MF="Diodes Inc.", MP=DMN2041L-7, SnapEDA_Link=https://www.snapeda.com/parts/DMN2041L-7/Diodes+Inc./view-part/?ref=snap
Q8 Q9 Q10 Q11 Q12 Q13 Q14: "P-Channel 20 V 3.5A (Ta) 510mW (Ta), 4.15W (Tc) Surface Mount TO-236AB", Package="SOT23-3 Nexperia USA Inc.", Check_prices=https://www.snapeda.com/parts/PMV48XPAR/Nexperia/view-part/?ref=eda, MF="Nexperia USA", MP=PMV48XPAR, SnapEDA_Link=https://www.snapeda.com/parts/PMV48XPAR/Nexperia/view-part/?ref=snap
R1 R3: library part gen_R_150R_0603, "SMD Resistor 150R 0603", Case EIA=0603, Case Metric=1608, Maximum Working Voltage=75V, Operating Temperature="-55°C - +155°C", PnP Package=0603R, Power=0.1W, Supplier Part Number 1=2303076, Tolerance=1%, AEC-Q Grade="Grade 0", AEC-Q Norm=AEC-Q200, Automotive Qualified=True, ECCN=EAR99, Part Number=gen_R_150R_0603, PnP Value=150R, Resistance=150R, Series="E24, E96", Supplier 1=Farnell
R2 R32 R43 R54 R65 R76 R87 R98: "SMD Resistor 10R 0805", Case EIA=0805, Case Metric=2012, Maximum Working Voltage=150V, Operating Temperature="-55°C - +155°C", Part Number=gen_R_10R_0805, PnP Package=0805R, Power=0.125W, Supplier Part Number 1=1750728, Tolerance=1%, AEC-Q Grade="Grade 0", AEC-Q Norm=AEC-Q200, Automotive Qualified=True, ECCN=EAR99, PnP Value=10R, Resistance=10R, Series="E24, E96", Supplier 1=Farnell
R4 R5 R10 R11 R16 R17 R24: "SMD Resistor 5k1 0603", Case EIA=0603, Case Metric=1608, Maximum Working Voltage=75V, Operating Temperature="-55°C - +155°C", Part Number=gen_R_5k1_0603, PnP Package=0603R, Power=0.1W, Supplier Part Number 1=667-ERJ-3GEYJ512V, Tolerance=5%, AEC-Q Norm=AEC-Q200, Automotive Qualified=True, ECCN=EAR99, PnP Value=5k1, Resistance=5k1, Series=E24, Supplier 1=Mouser
R6 R7 R12 R13 R18 R19 R22 R25 R28 R33 R39 R44 R50 R55 R61 R66 R72 R77 R83 R88 R94 R99: library part ERJPA3D3001V, "RES SMD 3K OHM 0.5% 1/4W 0603", Package="1608-2 Panasonic", Check_prices=https://www.snapeda.com/parts/ERJPA3D3001V/Panasonic/view-part/?ref=eda, MF=Panasonic, MP=ERJPA3D3001V, SnapEDA_Link=https://www.snapeda.com/parts/ERJPA3D3001V/Panasonic/view-part/?ref=snap
R8 R9 R14 R15 R20 R21 R26: "SMD Resistor 10k NTC 0402", Case EIA=0402, Maximum Working Voltage=50V, Operating Temperature="-40°C - +150°C", Part Number=gen_R_10k_NTC_0402, Power=0.150W, Supplier Part Number 1=2432559, Automotive Qualified=True, Resistance="10k NTC", Series=NTC, Supplier 1=Farnell, Supplier 2=Digikey, Supplier Part Number 2=495-76289-1-ND
R23 R29 R34 R40 R45 R51 R56 R62 R67 R73 R78 R84 R89 R95 R100: library part CRCW08052K00FKEA, "Resistor,Thick Film,Res 2 Kilohms,Pwr-Rtg 0.125 W,Tol 1%,SMT,0805,Tape & Reel", Package="2012 Vishay", Check_prices=https://www.snapeda.com/parts/CRCW08052K00FKEA/Vishay+Dale/view-part/?ref=eda, MF="Vishay Dale", MP=CRCW08052K00FKEA, SnapEDA_Link=https://www.snapeda.com/parts/CRCW08052K00FKEA/Vishay+Dale/view-part/?ref=snap
R27 R30 R35 R36 R38 R41 R46 R47 R49 R52 R57 R58 R60 R63 R68 R69 R71 R74 R79 R80 R82 R85 R90 R91 R93 R96 R101 R102: library part SR2512JK-7W10RL, "521 2W 2512", Package=None, Availability=Unavailable, MF="{'manufacturer': u'YAGEO'}", MP=RC2512JK-7W5R1L, Price=None
R31 R37 R42 R48 R53 R59 R64 R70 R75 R81 R86 R92 R97 R103: "SMD Resistor 68R 1206", Case EIA=2010, Case Metric=5025, Maximum Working Voltage=200V, Operating Temperature="-55°C - +155°C", Part Number=gen_R_68R_2010, PnP Package=2010R, Power=0.75W, Supplier Part Number 1=2323988, Tolerance=1%, Automotive Qualified=True, PnP Value=68R, Resistance=68R, Series=E24, Supplier 1=Farnell
T1: "Pulse HM2102NLT BMS Transformer", Manufacturer=Pulse, Operating Temperature="-40°C - +125°C", Supplier Part Number 1=673-HM2102NLT, AEC-Q Norm=AEC-Q200, Automotive Qualified=True, ComponentLink1Description=Datasheet, ComponentLink1URL=https://www.mouser.de/datasheet/2/336/HM2102NL-1218600.pdf, ECCN=EAR99, Part Number=HM2102NLT, Supplier 1=Mouser, Supplier 2=Digikey, Supplier Part Number 2=1840-1034-1-ND
U1: library part MC33771CTP1AE, "Battery Battery Cell Controller IC Lithium Ion 64-LQFP (10x10)", Package=None, Check_prices=https://www.snapeda.com/parts/MC33771CTP1AE/NXP+Semiconductors/view-part/?ref=eda, MF="NXP Semiconductors", MP=MC33771CTP1AE, SnapEDA_Link=https://www.snapeda.com/parts/MC33771CTP1AE/NXP+Semiconductors/view-part/?ref=snap
U2: Package=None, Availability=Unavailable, MP=INA253A2IPW, Price=None

## Free pads (board coordinates)
  round 0.6 hole 0.3: 2(36.449,105.41)
  round 3.2 hole 3.2 unplated: MH1(4,129) MH2(122,129) MH3(4,4) MH4(122,4)

## Via types
v1: diameter 0.6, hole 0.3, Top Layer to Bottom Layer, 129 vias

## Nets (pads, with @x,y where several pads share a name; then routed paths per layer and width w, separated by ;. In a path a pad name is that pad's centre, name@x,y a point inside that pad or via, vN(x,y) a via of type N, cw(c..) or ccw(c..) an arc to the next point about the centre after c; other vN are vias at no path point)
BAT_NEG: C1.1 C2.1 C3.2 C4.2 C5.2 C7.1 C8.1 C10.2 C22.1 C23.1 C24.1 C25.1 C27.2 C32.1 C33.1 C34.1 C35.1 C38.1 C39.1 C40.1 C41.1 C43.1 C44.1 C45.1 C46.2 C47.1 C48.2 C49.1 C50.1 C50.2 C51.2 C52.1 C53.2 C54.1 C55.2 C56.2 C57.1 C58.2 C59.1 C60.2 C61.2 C62.1 C63.2 C64.1 C65.2 C66.2 C67.1 C68.2 C69.1 C70.2 C71.2 C72.1 C73.2 C74.1 C75.2 C76.2 C77.1 C78.2 C79.1 C80.2 D1.2 D2.2 D3.2 D4.2 D5.2 D8.2 D12.1 D12.2 D13.1 D13.2 J3.8 Q1.2 R8.1 R9.1 R14.1 R15.1 R20.1 R21.1 R22.1 R26.1 R37.1 U1.39 U1.41 U1.44 U1.57 U1.58 U1.59 U1.63 U1.64 U1.65 U2.6 U2.10 U2.11 U2.16 U2.17 U2.18 U2.19 U2.20 | length 290.9
  Top Layer w0.25: R37.1@44.323,118.011 44.598,118.011 46.094,119.507 46.736,119.507 ; v1(44.577,120.142) 46.101,120.142 46.736,119.507 ; C46.2@45.33,109.982 45.33,109.822 45.78,109.372 45.94,109.372 46.473,108.839 v1(47.371,108.839) ; C79.1@48.895,20.184 50.664,20.184 51.324,20.844 51.324,21.396 51.562,21.634 v1(51.562,21.717) 50.927,22.352 C78.2@49.775,22.352 ; C61.2@48.895,62.085 v1(51.308,62.085) 53.204,62.085 C63.2@53.396,62.277 ; C51.2@48.895,85.217 48.895,84.201 49.553,83.543 51.657,83.543 52.73,84.616 52.73,84.776 53.18,85.226 C60.2@53.34,85.226 ; C80.2@49.394,27.686 49.394,27.526 49.844,27.076 50.521,27.076 v1(51.13,26.467) 51.205,26.392 53.062,26.392 C74.1@53.086,26.416 ; C70.2@50.029,56.515 50.029,56.675 50.479,57.125 51.283,57.125 v1(51.943,57.785) ; C50.2@50.047,117.856 50.038,117.865 50.038,119.507 ; C76.2@50.156,13.462 50.156,13.622 50.606,14.072 50.766,14.072 51.613,14.919 51.749,14.919 v1(51.816,14.986) 52.587,14.986 C77.1@53.73,13.843 ; C75.2@50.41,40.386 51.562,40.386 52.451,41.275 v1(52.451,44.323) C66.2@50.537,44.323 ; C72.1@50.796,32.253 50.791,32.258 v1(52.705,32.258) ; C56.2@51.299,74.295 51.299,71.637 C65.2@51.308,71.628 52.737,71.628 52.991,71.882 v1(53.086,71.882) ; C50.1@51.807,117.856 52.07,118.119 52.07,119.361 51.924,119.507 50.038,119.507 ; v1(52.705,34.925) 53.467,34.925 C71.2@54.61,36.068 ; C52.1@53.195,95.758 53.195,97.645 v1@54.483,98.933 ; C63.2@53.476,62.357 53.476,61.332 54.102,60.706 56.176,60.706 57.667,62.197 C64.1@57.667,62.357 ; v1(54.61,98.933) v1@54.483,98.933 ; v1(55.88,31.623) 56.007,31.623 56.736,32.352 57.507,32.352 C73.2@57.794,32.639 ; C48.2@56.252,109.22 57.15,109.22 57.912,109.982 57.912,113.157 v1(58.166,113.411) 56.633,113.411 56.506,113.284 C49.1@56.252,113.538 ; C54.1@56.778,100.838 C55.2@53.594,100.838 53.594,99.536 54.197,98.933 v1@54.483,98.933 ; C68.2@59.826,55.372 59.826,53.458 v1(59.944,53.34) ; C58.2@61.468,78.359 61.543,78.284 61.543,76.76 62.066,76.237 62.447,76.237 v1(62.484,76.2) 62.521,76.237 62.902,76.237 63.373,76.708 C59.1@63.373,78.359 ; 46.736,119.507 50.038,119.507
  Top Layer w0.5: J3.8@9.906,77.927 11.684,79.705 11.684,113.665 19.05,121.031 40.474,121.031 40.767,120.738 40.767,118.237 ; Q1.2@40.494,116.739 40.712,116.739 40.767,116.794 40.767,118.237 ; R37.1@44.323,118.011 40.993,118.011 40.767,118.237
  Bottom Layer w0.25: C5.2@72.517,25.476 72.784,25.476 74.228,24.032 74.228,23.689 74.964,23.689 76.802,25.527 C4.2@76.962,25.527 ; R21.1@73.787,36.126 74.979,34.934 74.979,34.232 C41.1@75.429,33.782 76.581,32.63 v1(76.581,31.75) ; U1.64@74.31,55.858 U1.63@74.81,55.858 ; C27.2@75.692,51.698 77.384,51.698 77.629,51.943 v1(77.724,51.943) ; U1.58@77.31,55.858 U1.57@77.81,55.858 ; C40.1@77.343,47.625 77.503,47.625 77.953,47.175 77.953,47.015 78.446,46.522 78.446,45.887 v1(78.486,45.847) ; R14.1@82.042,35.872 82.13,35.784 82.453,35.784 83.615,34.622 83.615,34.105 C33.1@84.065,33.655 85.63,33.655 86.011,33.274 v1(86.106,33.274) ; C32.1@82.677,47.625 82.837,47.625 84.742,45.72 v1(87.757,45.72) C24.1@87.757,47.625 ; U1.41@83.73,61.278 83.715,61.293 82.901,61.293 82.67,61.524 82.67,62.032 82.901,62.263 83.715,62.263 U1.39@83.73,62.278 ; v1(88.519,34.29) 90.032,35.803 R9.1@90.551,35.803 ; C25.1@92.311,32.893 v1(94.234,32.893) ; C44.1@93.091,47.625 93.091,46.196 93.345,45.942 v1(93.345,45.847) ; R26.1@98.425,35.745 98.425,35.738 98.567,35.596 98.567,35.222 99.949,33.84 99.949,33.265 C45.1@100.067,33.147 v1(101.981,33.147) ; C43.1@98.915,79.756 98.915,79.916 100.279,81.28 102.87,81.28 103.782,80.368 103.782,79.779 D12.1@103.505,79.502 104.114,78.893 104.876,78.893 106.172,77.597 v1(106.172,76.835) 106.172,75.297 105.17,74.295 103.72,74.295 D13.1@103.339,74.676 ; C38.1@98.933,47.625 98.933,45.942 99.06,45.815 v1(99.06,45.72) ; R22.1@99.187,72.988 99.191,72.992 99.191,73.938 99.558,74.305 ; v1(99.568,76.454) 99.635,76.387 99.635,76.202 99.695,76.142 ; v1(100.457,53.721) 100.491,53.755 102.558,53.755 U2.11@102.591,53.788 ; v1(100.457,57.15) 100.513,57.094 102.535,57.094 U2.16@102.591,57.038 U2.17@102.591,57.688 U2.18@102.591,58.338 U2.19@102.591,58.988 U2.20@102.591,59.638 ; D13.2@100.964,74.676 100.593,74.305 99.558,74.305 ; D12.2@101.13,79.502 101.13,79.277 99.695,77.842 99.695,76.142 ; v1(102.616,66.04) 102.997,66.04 103.759,66.802 C10.2@104.775,66.802 107.711,66.802 108.027,67.118 D4.2@108.077,67.118 ; C34.1@104.267,47.625 104.267,46.482 v1(105.029,45.72) ; R20.1@105.41,36.761 105.44,36.731 105.44,36.292 106.763,34.969 106.763,34.443 C39.1@107.17,34.036 108.998,34.036 109.125,33.909 v1(109.22,33.909) ; C22.1@109.347,47.625 109.507,47.625 109.957,47.175 109.957,46.253 v1(110.49,45.72) ; v1(109.601,70.485) 110.33,70.485 111.6,71.755 C8.1@111.76,71.755 ; v1(111.76,40.132) 111.827,40.065 112.15,40.065 R15.1@113.03,39.185 ; v1(113.538,68.326) 114.554,69.342 C7.1@114.554,70.249 115.715,70.249 116.927,71.461 116.927,73.047 D2.2@116.967,73.087 ; C35.1@115.189,35.179 116.872,35.179 116.999,35.052 v1(117.094,35.052) ; v1(118.745,36.322) 120.184,36.322 120.786,35.72 C23.1@120.786,35.56 ; v1@118.825,36.529 118.812,36.542 118.812,36.701 R8.1@119.888,37.777 ; C2.1@121.031,68.09 119.38,66.439 v1(119.38,65.786) 121.557,65.786 C1.1@121.684,65.659 ; v1(123.571,71.628) 123.571,71.723 123.698,71.85 D1.2@123.698,73.214 ; 99.558,74.305 99.695,74.441 99.695,76.142
  other v1: 74.295,23.622 50.8,83.566
CB_BOT1: Q7.1 R103.2 U1.6 | length 65.6
  Top Layer w0.25: Q7.1@40.313,25.247 43.055,25.247 R103.2@43.561,25.753 43.621,25.753 44.196,25.178 44.196,24.657 44.342,24.511 62.738,24.511 67.437,29.21 67.437,59.436 v1(67.691,59.69)
  Bottom Layer w0.25: v1(67.691,59.69) 69.644,59.69 70.207,60.253 71.687,60.253 71.697,60.263 72.375,60.263 U1.6@72.39,60.278
CB_BOT2: Q6.1 R92.2 U1.11 | length 54.3
  Top Layer w0.25: Q6.1@40.313,39.852 40.553,39.852 40.733,39.672 40.733,39.516 40.879,39.37 43.406,39.37 43.85,38.926 51.285,38.926 51.348,38.989 58.674,38.989 65.452,45.767 65.452,62.658 67.624,64.83 68.259,64.83 v1(68.326,64.897)
  Bottom Layer w0.25: v1(68.326,64.897) 68.326,64.832 68.583,64.576 68.583,64.26 68.839,64.003 69.525,63.317 70.415,63.317 70.954,62.778 U1.11@72.39,62.778
CB_BOT3: Q5.1 R81.2 U1.16 | length 55.3
  Top Layer w0.25: R81.2@44.196,53.566 43.921,53.566 43.131,54.356 Q5.1@40.894,54.356 40.894,53.467 42.037,52.324 48.641,52.324 56.007,59.69 v1(60.452,59.69)
  Signal Layer 2 w0.25: v1(60.452,59.69) 60.452,60.096 61.087,60.731 61.087,66.167 64.262,69.342 67.31,69.342 70.612,72.644 v1(71.12,72.644)
  Bottom Layer w0.25: v1(71.12,72.644) 71.12,69.251 71.454,68.917 71.454,65.619 71.78,65.293 72.375,65.293 U1.16@72.39,65.278
CB_BOT4: Q4.1 R70.2 U1.21 | length 49.2
  Top Layer w0.25: Q4.1@40.567,69.951 43.559,69.951 R70.2@43.942,69.568 58.646,69.568 60.96,71.882 65.659,71.882 70.993,77.216 76.2,77.216 v1(76.581,76.835)
  Bottom Layer w0.25: U1.21@76.31,67.198 76.31,73.394 76.454,73.538 76.454,76.514 76.514,76.574 76.514,76.768 v1(76.581,76.835)
CB_BOT5: Q3.1 R59.2 U1.26 | length 54.2
  Top Layer w0.25: Q3.1@40.567,85.445 41.428,85.445 42.037,84.836 43.787,84.836 R59.2@44.196,84.427 44.471,84.427 46.983,81.915 v1(57.912,81.915)
  Signal Layer 2 w0.25: v1(57.912,81.915) 57.979,81.848 58.233,81.848 60.325,79.756 77.216,79.756 81.153,75.819 v1(81.153,74.168)
  Bottom Layer w0.25: U1.26@78.81,67.198 78.81,71.064 81.153,73.407 v1(81.153,74.168)
CB_BOT6: Q2.1 R48.2 U1.31 | length 65.8
  Top Layer w0.25: Q2.1@40.948,100.177 41.188,100.177 42.171,99.194 43.095,98.27 R48.2@44.323,98.27 44.422,98.171 v1(48.895,98.171)
  Signal Layer 2 w0.25: v1(48.895,98.171) 48.962,98.104 49.156,98.104 49.597,97.663 66.421,97.663 84.016,80.068 84.016,77.401 84.592,76.825 v1(84.592,71.882)
  Bottom Layer w0.25: U1.31@81.31,67.198 81.31,68.483 v1@84.65,71.823
CB_BOT7: Q1.1 R37.2 U1.36 | length 86.2
  Top Layer w0.25: Q1.1@40.494,114.909 44.071,114.909 R37.2@44.323,115.161 44.323,114.046 51.112,107.257 67.495,107.257 86.624,88.128 86.624,66.411 86.995,66.04 86.995,64.075 87.249,63.821 v1(87.249,63.754)
  Bottom Layer w0.25: U1.36@83.73,63.778 83.754,63.754 v1(87.249,63.754)
CB_COM1: R98.2 U1.5 | length 51.4
  Top Layer w0.25: R98.2@55.281,21.336 60.833,21.336 69.342,29.845 69.342,37.226 69.977,37.861 69.977,52.705 68.707,53.975 v1(68.707,58.674)
  Bottom Layer w0.25: v1(68.707,58.674) 69.465,58.674 70.594,59.803 72.365,59.803 U1.5@72.39,59.778
CB_COM2: R87.2 U1.10 | length 36.4
  Top Layer w0.25: R87.2@63.699,32.639 63.699,32.814 66.352,35.467 66.352,60.637 v1(68.707,62.992)
  Bottom Layer w0.25: v1(68.707,62.992) 68.774,62.925 68.968,62.925 69.028,62.865 70.231,62.865 70.818,62.278 U1.10@72.39,62.278
CB_COM3: D7.2 R76.2 U1.15 | length 37.9
  Top Layer w0.25: v1(62.738,53.322) 62.738,53.819 63.142,54.223 63.142,54.61 63.487,54.955 R76.2@63.627,54.955
  Signal Layer 2 w0.25: v1(62.738,53.322) 65.006,53.322 65.786,54.102 65.786,66.929 70.037,71.18 70.291,71.18 v1(70.358,71.247)
  Bottom Layer w0.25: v1(62.738,53.322) 62.738,49.844 64.084,48.498 D7.2@64.135,48.498 ; v1(70.358,71.247) 70.425,71.18 70.425,70.986 70.612,70.799 70.612,65.917 71.007,65.522 71.007,65.347 71.561,64.793 72.375,64.793 U1.15@72.39,64.778
CB_COM4: D10.2 R65.2 U1.20 | length 41.2
  Top Layer w0.25: v1(63.373,63.373) 63.44,63.44 63.44,63.694 64.135,64.389 64.135,65.369 R65.2@64.298,65.532 64.298,69.251 68.961,73.914 75.057,73.914 v1(75.438,73.533)
  Bottom Layer w0.25: v1(63.373,63.373) 64.77,61.976 64.77,55.626 68.58,51.816 68.58,50.53 D10.2@68.707,50.403 ; v1(75.438,73.533) 75.81,73.161 U1.20@75.81,67.198
CB_COM5: R54.2 U1.25 | length 43.7
  Top Layer w0.25: R54.2@63.155,87.63 82.804,87.63 84.709,85.725 v1(84.709,78.613)
  Bottom Layer w0.25: U1.25@78.31,67.198 78.31,71.579 80.274,73.543 80.274,74.427 84.46,78.613 v1(84.709,78.613)
CB_COM6: R43.2 U1.30 | length 47.1
  Top Layer w0.25: v1(57.531,91.948) 57.568,91.985 57.568,92.366 58.201,92.999 58.928,92.999 R43.2@59.273,93.345
  Signal Layer 2 w0.25: v1(57.531,91.948) 57.598,91.881 57.792,91.881 57.852,91.821 71.12,91.821 83.566,79.375 83.566,72.009 v1(82.296,70.739)
  Bottom Layer w0.25: U1.30@80.81,67.198 80.81,69.253 v1(82.296,70.739)
CB_COM7: R32.2 U1.35 | length 62.2
  Top Layer w0.25: R32.2@60.905,109.093 66.802,109.093 87.249,88.646 v1(87.249,67.056)
  Bottom Layer w0.25: U1.35@83.73,64.278 86.376,64.278 87.249,65.151 v1(87.249,67.056)